# Altium PCB PCB_Sonography-v1.0.PcbDoc (part 1 of 3)
Units mil, origin at the board's own origin, x right, y up, seen from the top; angles counter-clockwise.
Board outline 1550.13 x 1118 mil, 4 copper layers (Top Layer, GND/Signal, PWR/Signal, Bottom Layer), stack 62.449 mil thick; 109 components, 55 nets, 355 pads, 157 vias.
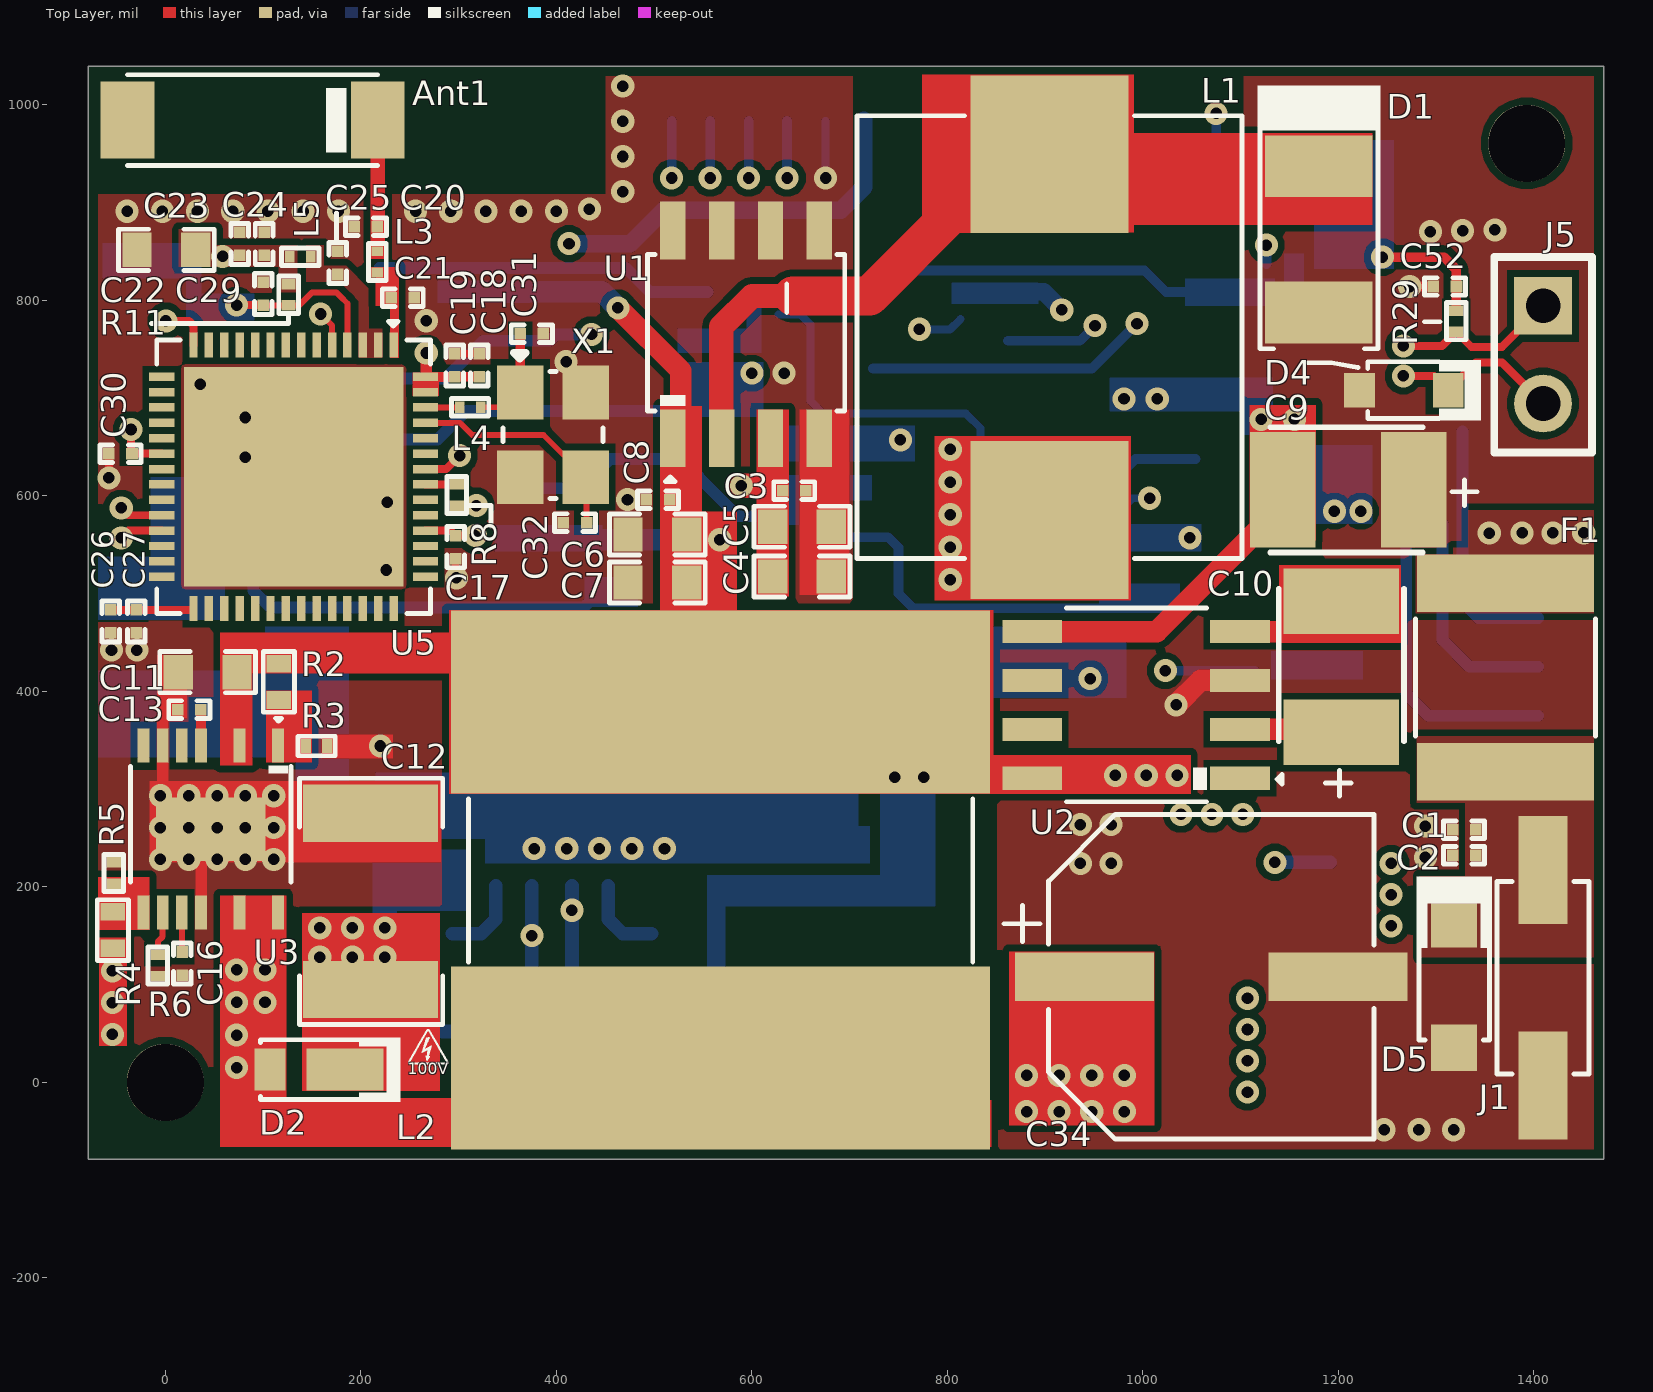
[diagram p0: Top Layer view]
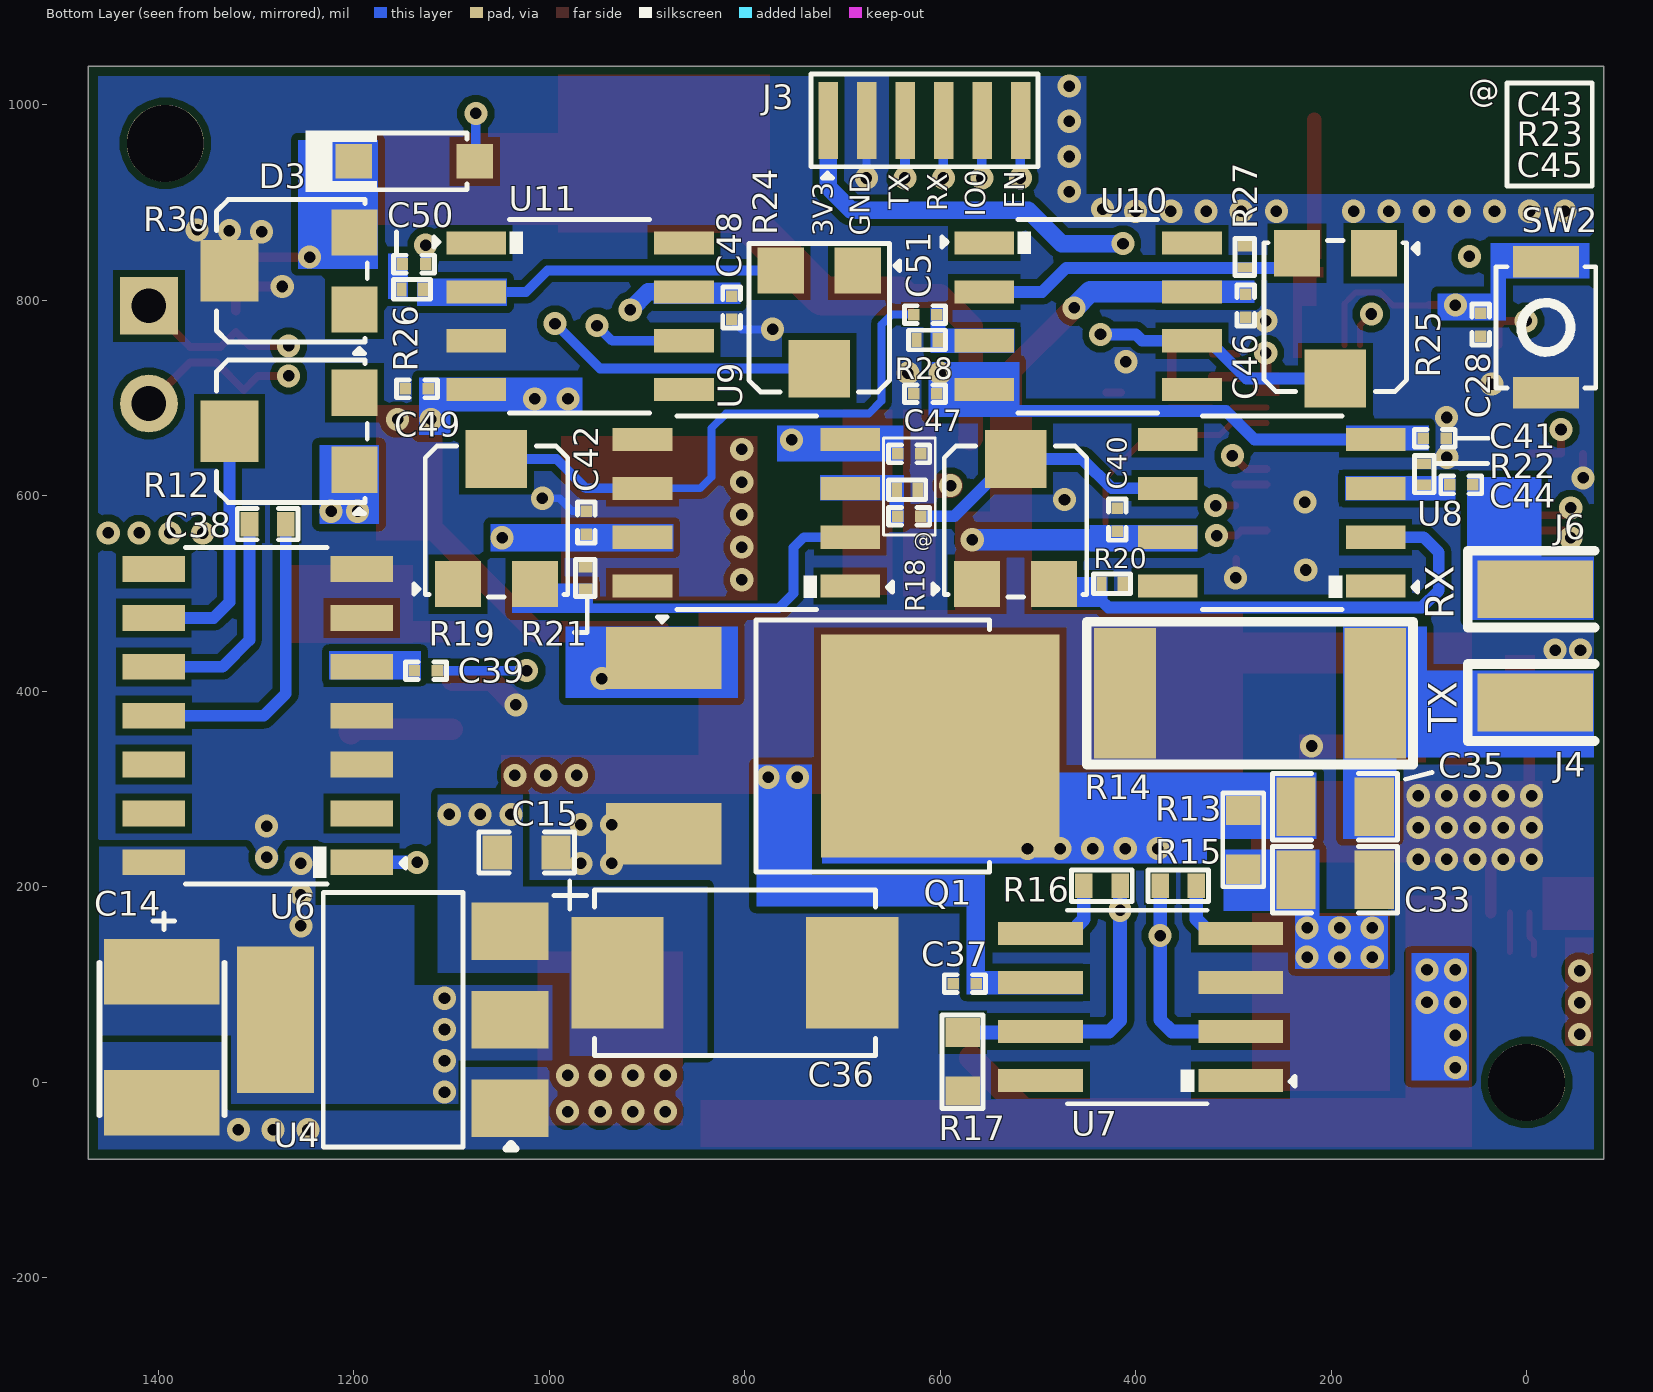
[diagram p1: Bottom Layer view, seen from below]
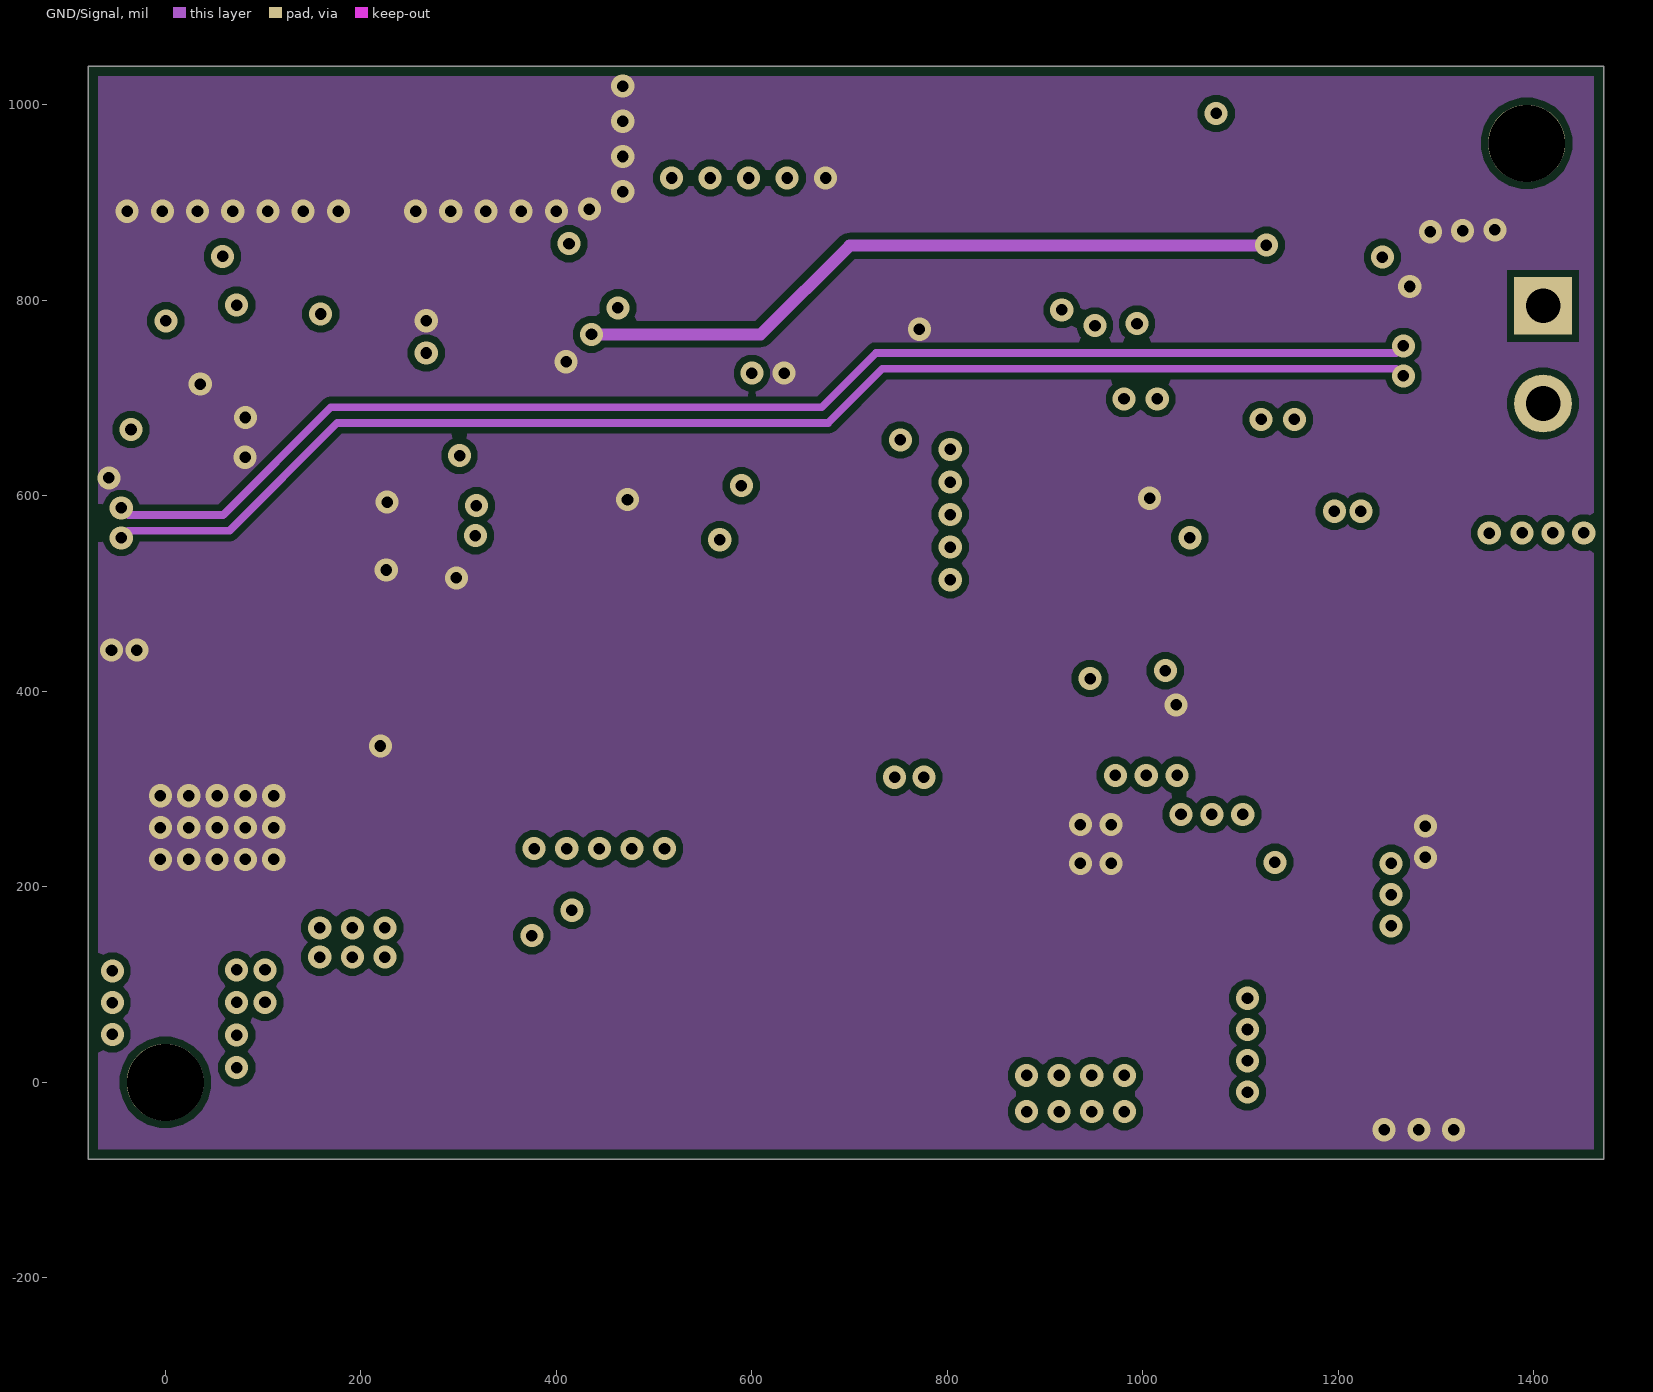
[diagram p2: GND/Signal]
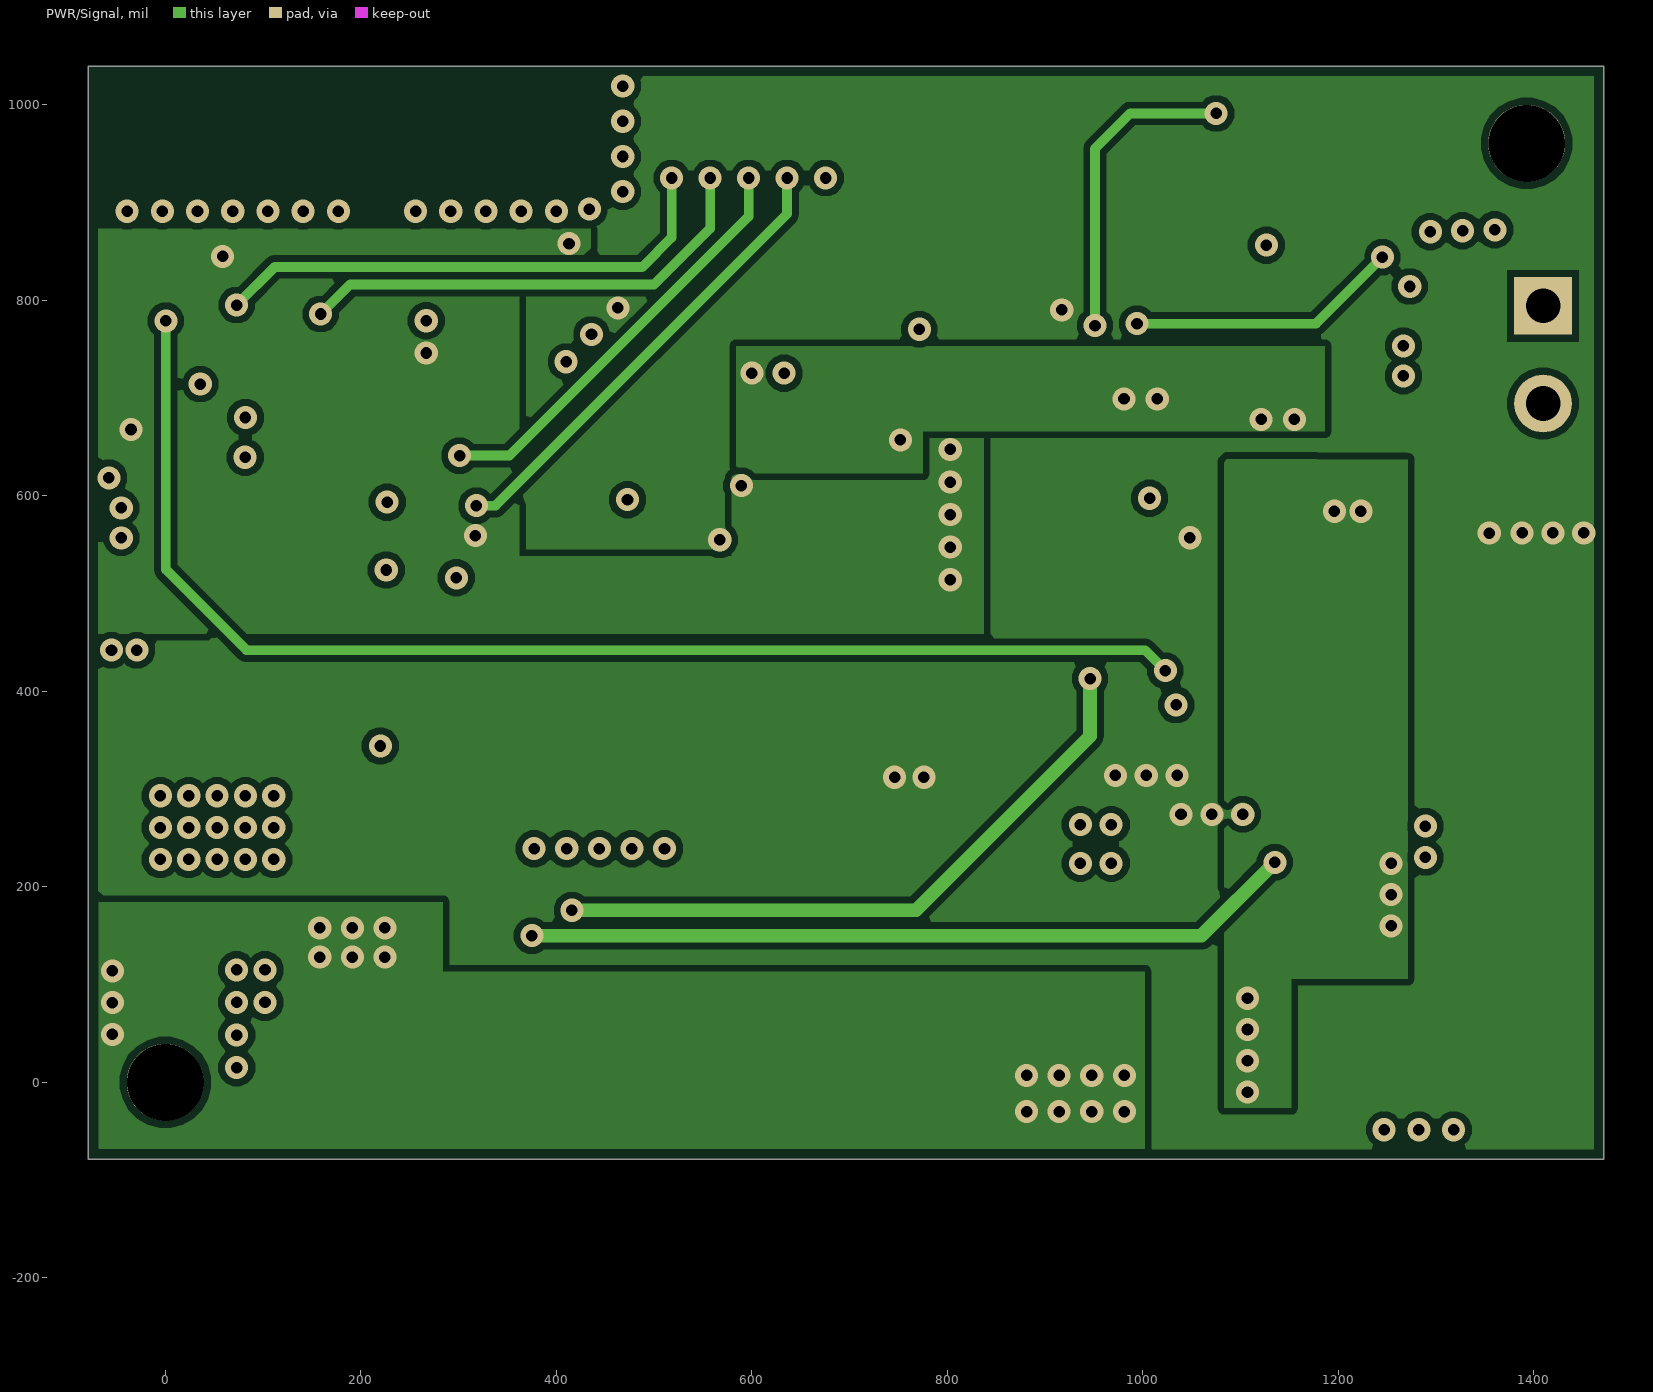
[diagram p3: PWR/Signal]
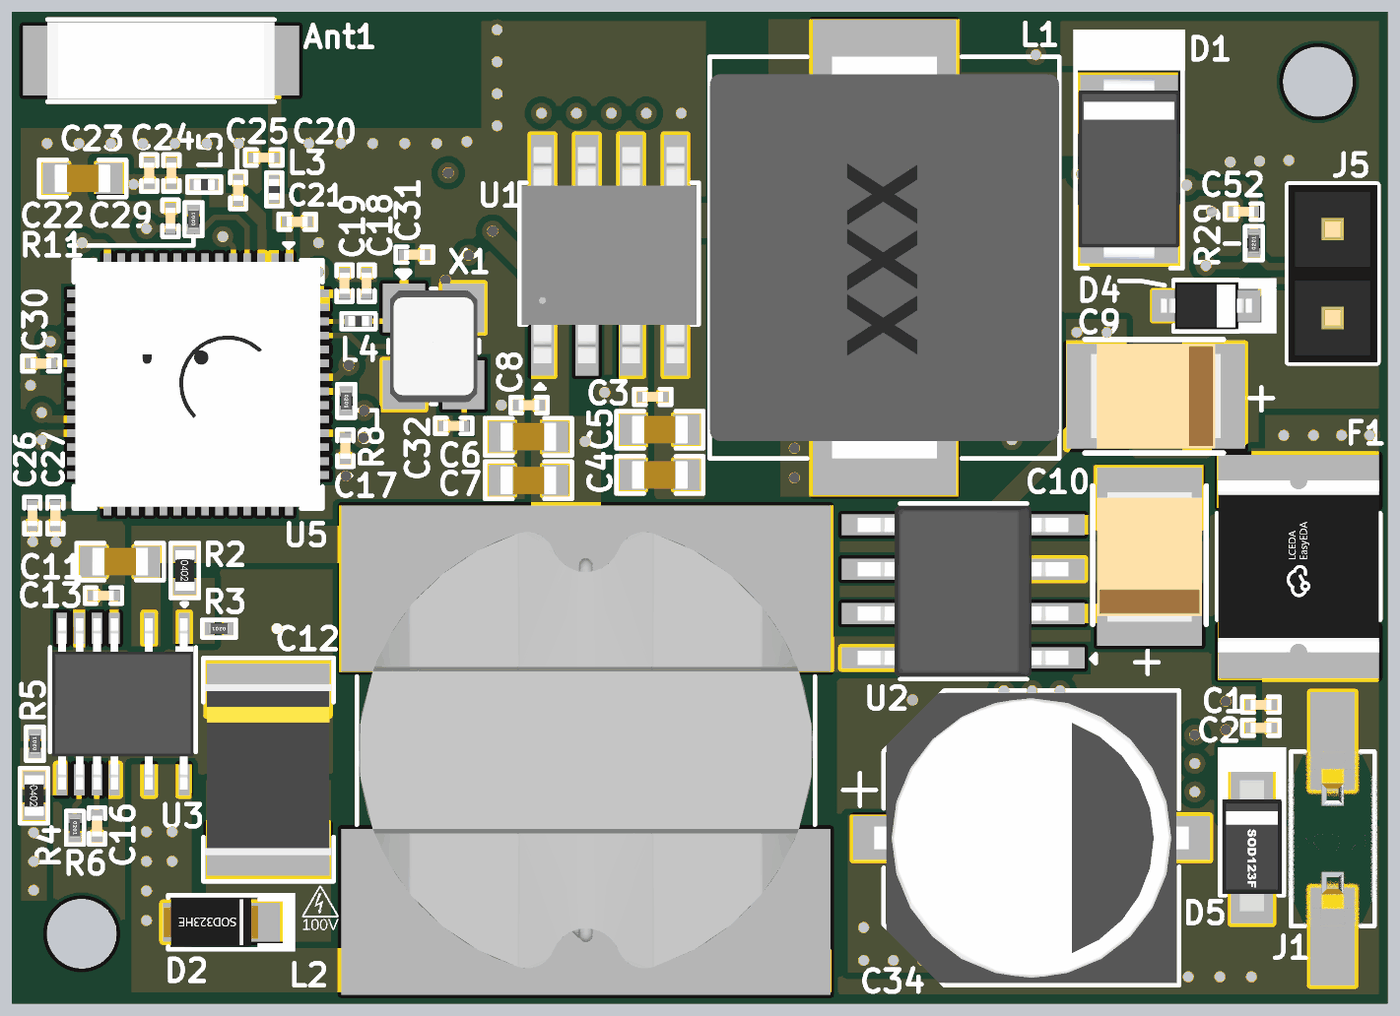
[diagram p5: 3D render of the assembled board from above, using the file's embedded part models]
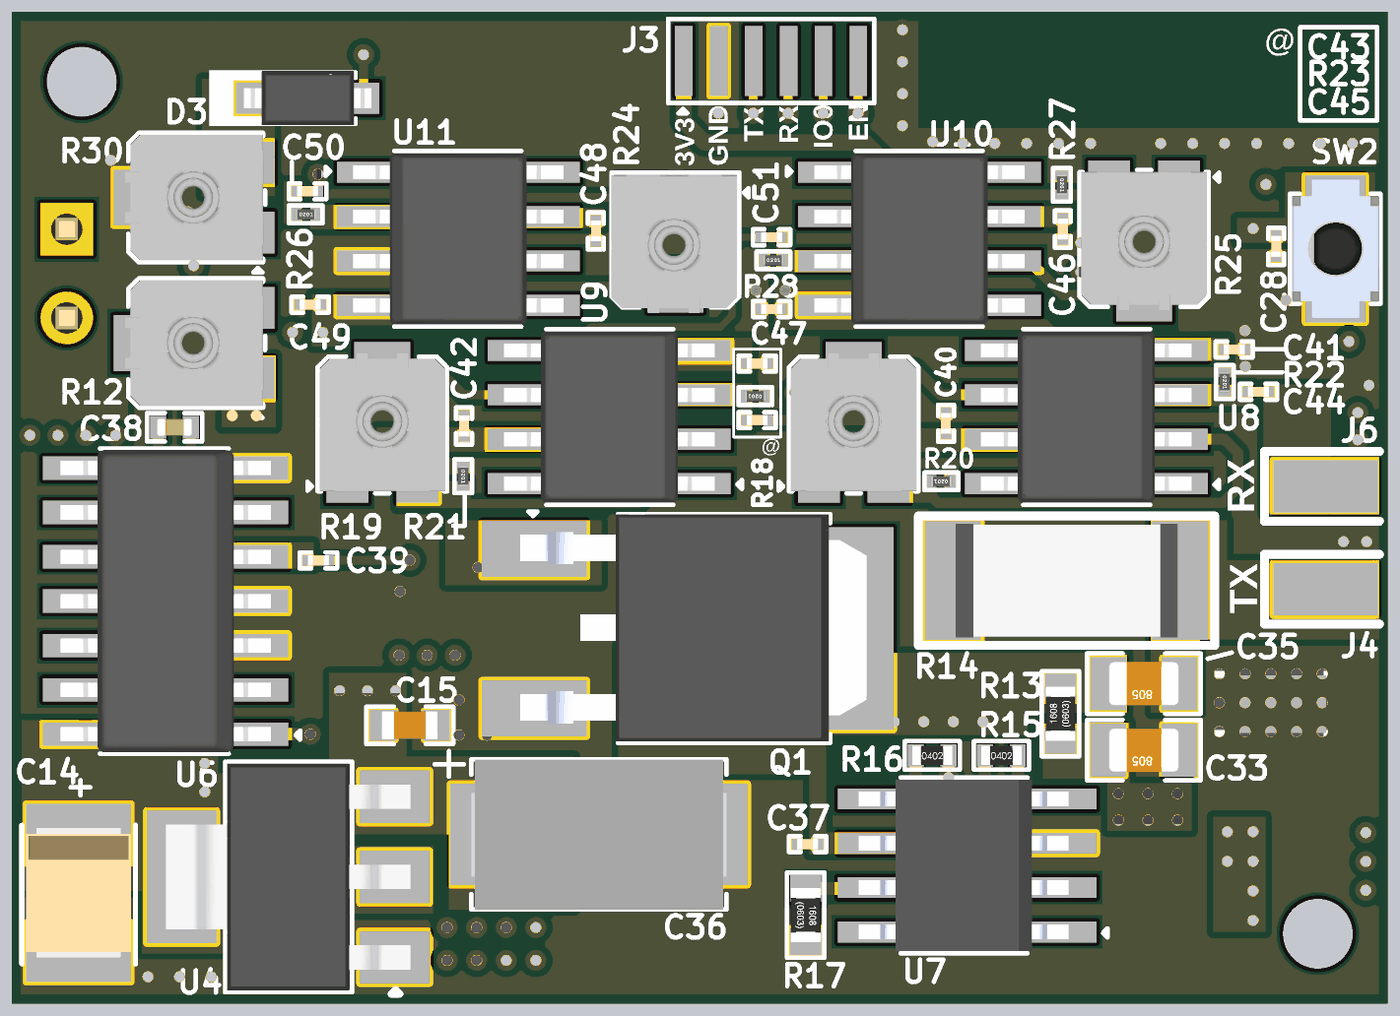
[diagram p6: 3D render of the assembled board from below, using the file's embedded part models]

## Layer stack, top to bottom
Top Solder: solder mask 0.394, Solder Resist, Dk 3.5
Top Layer: signal copper 1.378
Dielectric 2: prepreg 8.284, PP-006, Dk 4.4
GND/Signal: signal copper 0.598
Dielectric 1: core 41.929, FR-4, Dk 4.6
PWR/Signal: signal copper 0.598
Dielectric 3: prepreg 8.284, PP-006, Dk 4.4
Bottom Layer: signal copper 1.378
Bottom Solder: solder mask 0.394, Solder Resist, Dk 3.5

## Board outline
-78.74,-78.74 -78.74,1039.26 1471.39,1039.26 1471.39,-78.74

## Design rules (kind name [scope] priority, off if disabled: settings)
BoardOutlineClearance [All] p1: gap=0 ignorepadtopadclearanceinfootprint=FALSE except(10: Poly-OutlineEdge)
Clearance [All] p1: gap=7 ignorepadtopadclearanceinfootprint=FALSE except(4: Arc-SMDPad Track-SMDPad SMDPad-SMDPad)
DiffPairsRouting [All] p1: maxlimit=10 minlimit=6 mostfreqgap=8 toplayer_minwidth=6 toplayer_maxwidth=8 toplayer_prefwidth=8 midlayer1_minwidth=6 midlayer1_maxwidth=8 midlayer1_prefwidth=8 midlayer2_minwidth=6 midlayer2_maxwidth=8 midlayer2_prefwidth=8 bottomlayer_minwidth=6 bottomlayer_maxwidth=8 bottomlayer_prefwidth=8 maxuncoupledlength=500
HoleSize [All] p1: absolutevalues=TRUE maxlimit=1000 minlimit=1 maxpercent=80.000 minpercent=20.000
HoleToHoleClearance [All] p1: gap=0 allowstackedmicrovias=TRUE
MatchedLengths "Schematic Matched Net Lengths" [InNetClass('RX_OUT')] p1: tolerance=50 checknetsindiffpair=TRUE checkdiffpairvsdiffpair=FALSE checkxsignals=FALSE checkothers=FALSE
MaxMinImpedance "Schematic Impedance Constraint" [InNetClass('RX_OUT')] p1: minimum=85.00 maximum=90.00
MinimumSolderMaskSliver [All] p1: minsoldermaskwidth=0
PolygonConnect [All] p1: connectstyle=Direct reliefconductorwidth=10 reliefentries=4 polygonreliefangle="90 Angle" airgapwidth=10
RoutingVias [All] p1: holewidth=11.81 width=23.62 viastyle="Through Hole" minholewidth=11.81 minwidth=23.62 maxholewidth=31.5 maxwidth=62.99
SilkToSilkClearance [All] p1: silktosilkclearance=0
SilkToSolderMaskClearance [IsPad] p1: minsilkscreentomaskgap=0 clearancetoexposedcopper=TRUE
SolderMaskExpansion [All] p1: expansion=4 istentingtop=FALSE
UnRoutedNet [All] p1: checkbadconnections=TRUE
Width [All] p1: maxlimit=100 minlimit=6 preferedwidth=22
Width RF_Width [InNet('NetANT1_1')] p2: maxlimit=55 minlimit=15 preferedwidth=15 toplayer_maxwidth=15 bottomlayer_maxwidth=15 impedanceprofiledriven=TRUE impedanceprofileid={05ECE8B4-7C36-483A-8716-DD2929808501} impedanceprofilevalue=50.000000 minimp=50.000000 maximp=50.000000 favimp=50.000000 // Impedence
23 further rules are at their usual default settings.

## Classes and differential pairs
net class RF: NetANT1_1 NetC21_2
differential pair class RX_OUT_Lines: RX_OUT
net class RX_OUT: RX_OUT_N RX_OUT_P
component class U_Transmitter_Receiver_Section: C33 C34 C35 C36 C37 C38 C39 C40 C41 C42 C43 C44 C45 C46 C47 C48 C49 C50 C51 C52 D3 D4 J4 J5 J6 Q1 R12 R13 R14 R15 R16 R17 R18 R19 R20 R21 R22 R23 R24 R25 R26 R27 R28 R29 R30 U6 U7 U8 U9 U10 U11
component class U_Power_Section: C1 C2 C3 C4 C5 C6 C7 C8 C9 C10 C11 C12 C13 C14 C15 C16 D1 D2 D5 F1 J1 L1 L2 R2 R3 R4 R5 R6 U1 U2 U3 U4
component class U_Controller_Section: Ant1 C17 C18 C19 C20 C21 C22 C23 C24 C25 C26 C27 C28 C29 C30 C31 C32 J3 L3 L4 L5 R8 R11 SW2 U5 X1
differential pair RX_OUT: +RX_OUT_P -RX_OUT_N

## Components (designator, comment, footprint, x,y, rotation, side; value= is the part's Value field where it differs from the comment)
Ant1 "AN6520-245" AN6520-245 89.39,984.26 r180 top locked (schematic designator ANT1)
C1 "1uF" CAP-0201 1328.58,258.26 r0 top locked
C2 "0.1uF" CAP-0201 1328.58,232.26 r0 top locked value=100nF
C3 "0.1uF" CAP-0201 643.39,605.26 r180 top locked value=100nF
C4 "10uF" Cap-0603 651.39,517.26 r180 top locked
C5 "10uF" Cap-0603 651.39,568.26 r180 top locked
C6 "10uF" Cap-0603 503.38,560.26 r0 top locked
C7 "10uF" Cap-0603 503.38,511.26 r0 top locked
C8 "0.1uF" CAP-0201 504,596 r0 top locked value=100nF
C9 "10uF" Case-B 1210.07,606 r180 top locked
C10 "10uF" Case-B 1203,425 r90 top locked
C11 "10uF" Cap-0603 43.39,419.5 r180 top locked
C12 "1uF" Cap-1812 210,185 r270 top locked
C13 "1uF" CAP-0201 24.58,381.26 r180 top locked
C14 "10uF" Case-B 1396,46.07 r270 bottom locked
C15 "10uF" Cap-0603 1023,235 r0 bottom locked
C16 "0.1uF" CAP-0201 17.39,121.45 r270 top value=100nF
C17 "0.1uF" CAP-0201 297.1,547.36 r90 top locked value=100nF
C18 "1uF" CAP-0201 321.1,733.36 r270 top locked
C19 "0.1uF" CAP-0201 296.1,733.36 r270 top locked value=100nF
C20 "2.7pF" CAP-0201 205.19,875 r0 top locked
C21 "4.7pF" CAP-0201 242.91,802.55 r180 top locked
C22 "10uF" Cap-0603 1.1,851.55 r0 top locked
C23 "1uF" CAP-0201 76.1,857.55 r270 top locked
C24 "0.1uF" CAP-0201 101.1,857.55 r270 top locked value=100nF
C25 "0.1uF" CAP-0201 176.39,838.07 r270 top locked value=100nF
C26 "0.1uF" CAP-0201 -55.61,471.45 r90 top locked value=100nF
C27 "1uF" CAP-0201 -29.61,471.45 r90 top locked
C28 "0.1uF" CAP-0201 47,775 r90 bottom locked value=100nF
C29 "1uF" CAP-0201 100.1,806.55 r270 top locked
C30 "0.1uF" CAP-0201 -45.81,643 r0 top locked value=100nF
C31 "22pF" CAP-0201 374.91,765.55 r180 top locked
C32 "22pF" CAP-0201 419.1,572.55 r0 top locked
C33 "100nF" Cap-0805 196,207 r0 bottom locked
C34 "22uF" VKMD1652D220MV 1070,108 r0 top locked
C35 "100nF" Cap-0805 196,282 r0 bottom locked
C36 "47uF" Case-D 809.92,112 r180 bottom locked
C37 "0.1uF" CAP-0201 574.81,101 r180 bottom locked value=100nF
C38 "50pF" Cap-0402 1288,571 r0 bottom locked
C39 "1nF" CAP-0201 1126,421 r180 bottom locked
C40 "0.1uF" CAP-0201 418.89,575.45 r270 bottom locked value=100nF
C41 "0.1uF" CAP-0201 94.11,658.74 r0 bottom locked value=100nF
C42 "0.1uF" CAP-0201 961.9,572.45 r270 bottom locked value=100nF
C43 "0.1uF" CAP-0201 631.7,642.74 r0 bottom locked value=100nF
C44 "1nF" CAP-0201 67,611 r0 bottom locked
C45 "1nF" CAP-0201 631.7,579 r0 bottom locked
C46 "0.1uF" CAP-0201 287.4,794.45 r90 bottom locked value=100nF
C47 "0.1uF" CAP-0201 615.4,704.26 r180 bottom locked value=100nF
C48 "0.1uF" CAP-0201 813.39,792.45 r90 bottom locked value=100nF
C49 "0.1uF" CAP-0201 1135.2,709.26 r180 bottom locked value=100nF
C50 "1nF" CAP-0201 1138.2,837 r0 bottom locked
C51 "1nF" CAP-0201 615.4,785.26 r180 bottom locked
C52 "1nF" CAP-0201 1309,814 r0 top locked
D1 "B340A" SMA(DO-214AC) 1180,862.2 r270 top locked
D2 "RB558VAM150TR" SOD-323HE 145.62,13 r180 top locked
D3 "1N4148W" SOD-123 1137.99,942 r0 bottom locked
D4 "MM3Z3V3" SOD-323 1267,708 r180 top locked
D5 "SMF12A" SOD-123F 1318.39,98.27 r90 top locked
F1 "SMD2018-200" SMD2018-200 1371,414 r90 top locked
J1 "X6521WVS-2x01H-C60D74" X6521WVS-2x01H-C60D74 1409.39,107.02 r270 top locked
J3 "1x6P" 1x6p 615.94,984 r180 bottom locked
J4 "1P SMD PAD" "1P SMD PAD" -8.75,388.42 r270 bottom locked
J5 "826629-2" HDR1X2_ 1409.39,794.26 r270 top locked
J6 "1P SMD PAD" "1P SMD PAD" -8.75,504.42 r270 bottom locked
L1 "47uH" SMMS1050-470M 904.39,762.26 r270 top locked
L2 "100uH" SDR1307A-101K 568,207 r90 top locked
L3 "1.6nH" IND-0201 217,839.17 r270 top locked
L4 "24nH" IND-0201 311.92,690.55 r0 top locked
L5 "2nH" IND-0201 138.1,844.55 r0 top locked
Q1 "5N20A-252" DPAK 741.34,344 r270 bottom locked
R2 "1M" Res-0402 116.21,409.5 r270 top locked
R3 "287K" Res-0201 154.83,344 r180 top locked value=287kR
R4 "1M" Res-0402 -53.61,155.76 r270 top locked
R5 "16.2K" Res-0201 -52.61,214.09 r90 top locked
R6 "154K" Res-0201 -7.61,119.43 r270 top locked value=154kR
R8 "499R" Res-0201 298.1,600.72 r270 top locked
R11 "10K" Res-0201 126.1,805.55 r90 top locked
R12 "10K" TC33X-2-103E_ 1263,666 r90 bottom locked
R13 "3K" Res-0603 290,248 r270 bottom locked
R14 "51R" RES-2512 283,398 r180 bottom locked
R15 "0R" Res-0402 356.5,201 r180 bottom locked
R16 "0R" Res-0402 434.5,201 r180 bottom locked
R17 "10K" Res-0603 577,21 r90 bottom locked
R18 "10K" TC33X-2-103E_ 522.89,573.53 r180 bottom locked
R19 "10K" TC33X-2-103E_ 1053.87,573.53 r180 bottom locked
R20 "68R" Res-0201 424.17,510 r0 bottom locked
R21 "820R" Res-0201 962.9,515.83 r270 bottom locked
R22 "330R" Res-0201 105,622 r270 bottom locked
R23 "470R" Res-0201 633.7,606 r0 bottom locked
R24 "100K" TC33X-2-104E_ 684.39,830.39 r0 bottom locked
R25 "10K" TC33X-2-103E_ 195.68,783.97 r0 bottom locked
R26 "330R" Res-0201 1140.2,811 r180 bottom locked
R27 "1.5K" Res-0201 288.4,844.26 r270 bottom locked
R28 "1K" Res-0201 613.4,759.26 r180 bottom locked value=1kR
R29 "100R" Res-0201 1320.54,778.57 r90 top locked
R30 "10K" TC33X-2-103E_ 1263,830 r90 bottom locked
SW2 "B3U-1000P" B3U-1000P -19.61,772.26 r90 bottom locked
U1 "AP1509-33SG-13" SOP-8L 594.09,764.97 r90 top locked
U2 "TL7660CDR" "SOIC-8(0.154\", 3.90mm Width)" 993,386 r180 top locked
U3 "LT8331IMSE#TRPBF" 16-MSOP-EP 46.52,258.96 r270 top locked
U4 "AMS1117-5.0" "SOT- 223" 1160,64 r90 bottom locked
U5 "ESP32-S3FH4R2" "QFNWB-56 (7×7)" 131.25,619.42 r270 top locked
U6 "SN74121D" SOIC-14 1298,375 r0 bottom locked
U7 "ICL7667CBAZA" "SOIC-8(0.150\", 3.80mm Width)" 399,77 r0 bottom locked
U8 "AD811JRZ" "SOIC-8(0.154\", 3.90mm Width)" 260.89,582.55 r0 bottom locked
U9 "AD811JRZ" "SOIC-8(0.154\", 3.90mm Width)" 798.2,582.55 r0 bottom locked
U10 "AD811JRZ" "SOIC-8(0.154\", 3.90mm Width)" 448.68,783.47 r180 bottom locked
U11 "LM7171AIMX/NOPB" "SOIC-8(0.154\", 3.90mm Width)" 968.39,783.47 r180 bottom locked
X1 "40MHz" X322540MPB4SI_ 396.56,662.24 r270 top locked value=40MHZ

## Footprints (in the part's own frame and the unit in brackets; to place one, negate y for a bottom-side part, rotate by r counter-clockwise, add the part's x,y. Pads: shape width x height; smd on the part's side, far side on the other; paste and mask are expansions set on the pad)
"1P SMD PAD" [mm]
  rect 1.5x3 smd: 1(0,0)
  silkscreen extent -1,-1.75 1,1.54
1x6p [mm]
  rect 0.5x2 smd: 1(-2.5,0) 2(-1.5,0) 3(-0.5,0) 4(0.5,0) 5(1.5,0) 6(2.5,0)
  silkscreen extent -2.95,-1.5 2.95,1.21
16-MSOP-EP [mm]
  rect 0.889x0.305 smd: 1(-2.169,1.75) 3(-2.169,0.75) 5(-2.169,-0.25) 6(-2.169,-0.75) 7(-2.169,-1.25) 8(-2.169,-1.75) 9(2.17,-1.75) 10(2.17,-1.25) 11(2.17,-0.75) 12(2.17,-0.25) 14(2.17,0.75) 16(2.17,1.75)
  rect 1.651x2.845 smd: 17(0,0)
  silkscreen extent -2.88,-2.08 1.37,2.08, body extent -2.45,-2.02 2.45,2.02, height 1.07
AN6520-245 [mm]
  rect 1.4x2 smd: 1(-3.25,0) 2(3.25,0)
  silkscreen extent -3.25,-1.18 3.25,1.18, body extent -3.25,-1.1 3.25,1.1, height 1
B3U-1000P [mm] "SWITCH TACTILE SPST-NO 0.05A 12V"
  rect 0.82x1.72 smd: 1(-1.7,0) 2(1.7,0)
  silkscreen extent -1.57,-1.3 1.57,1.3, body extent -2,-1.26 2,1.24, height 1.6
CAP-0201 [mm]
  rect 0.3x0.3 smd mask+0.055: 1(-0.3,0) 2(0.3,0)
  silkscreen extent -0.53,-0.23 0.53,0.23, body extent -0.3,-0.15 0.3,0.15, height 0.28
Cap-0402 [mil]
  rect 18x25 smd mask+2.36: 1(-18.5,0) 2(18.5,0)
  silkscreen extent -31,-16 31,16, body extent -20,-10 20,10, height 19
Cap-0603 [mil]
  rect 30x35 smd mask+2.36: 1(-30,0) 2(30,0)
  silkscreen extent -49,-21 49,21, body extent -32,-16 31,16, height 34
Cap-0805 [mil] "SMD 0805"
  rect 40x60 smd mask+2.76: 1(-40,0) 2(40,0)
  silkscreen extent -64,-34 64,34, body extent -39,-25 39,25, height 30
Cap-1812 [mm]
  rect 1.485x3.507 smd: 1(-2.293,0) 2(2.293,0)
  silkscreen extent -3.2,-1.85 3.2,1.88, body extent -2.45,-1.8 2.45,1.8, height 2.79
Case-B [mm]
  rect 1.7x3 smd paste+0: 1(-1.7,0) 2(1.7,0)
  silkscreen extent -3.35,-1.63 2.03,1.63, body extent -1.85,-1.5 1.85,1.5, height 2.16
Case-D [mm]
  rect 2.4x2.9 smd: 1(-3.05,0) 2(3.05,0)
  silkscreen extent -4.7,-2.15 3.65,2.39, body extent -3.65,-2.16 3.65,2.14, height 4
DPAK [mm]
  rect 1.6x3 smd: 1(-2.285,-3.59) 3(2.285,-3.59)
  rect 5.8x6.2 smd: 2(0,3.59)
  silkscreen extent -3.35,-3.76 3.28,4.88, body extent -3.28,-3.99 3.22,5.92, height 2.51
HDR1X2_ [mm] "CONN HEADER VERT 2POS 2.54MM"
  rect 1.5x1.5 hole 0.9: 1(0,0)
  round 1.5 hole 0.9: 2(2.54,0)
  silkscreen extent -1.27,-1.27 3.81,1.27, body extent -1.27,-1.27 3.81,1.27, height 8.44
IND-0201 [mm]
  rect 0.25x0.3 smd mask+0.055: 1(-0.275,0) 2(0.275,0)
  silkscreen extent -0.48,-0.23 0.48,0.23, body extent -0.3,-0.15 0.3,0.15, height 0.15
"QFNWB-56 (7×7)" [mm]
  rect 0.65x0.22 smd: 1(-3.425,2.6) 2(-3.425,2.2) 3(-3.425,1.8) 4(-3.425,1.4) 5(-3.425,1) 6(-3.425,0.6) 7(-3.425,0.2) 8(-3.425,-0.2) 9(-3.425,-0.6) 10(-3.425,-1) 11(-3.425,-1.4) 12(-3.425,-1.8) 13(-3.425,-2.2) 14(-3.425,-2.6) 29(3.425,-2.6) 30(3.425,-2.2) 31(3.425,-1.8) 32(3.425,-1.4) 33(3.425,-1) 34(3.425,-0.6) 35(3.425,-0.2) 36(3.425,0.2) 37(3.425,0.6) 38(3.425,1) 39(3.425,1.4) 40(3.425,1.8) 41(3.425,2.2) 42(3.425,2.6)
  rect 0.22x0.65 smd: 15(-2.6,-3.425) 16(-2.2,-3.425) 17(-1.8,-3.425) 18(-1.4,-3.425) 19(-1,-3.425) 20(-0.6,-3.425) 21(-0.2,-3.425) 22(0.2,-3.425) 23(0.6,-3.425) 24(1,-3.425) 25(1.4,-3.425) 26(1.8,-3.425) 27(2.2,-3.425) 28(2.6,-3.425) 43(2.6,3.425) 44(2.2,3.425) 45(1.8,3.425) 46(1.4,3.425) 47(1,3.425) 48(0.6,3.425) 49(0.2,3.425) 50(-0.2,3.425) 51(-0.6,3.425) 52(-1,3.425) 53(-1.4,3.425) 54(-1.8,3.425) 55(-2.2,3.425) 56(-2.6,3.425)
  rect 5.7x5.7 smd: 57(0,0)
  silkscreen extent -4.04,-3.56 3.56,3.56, body extent -3.5,-3.51 3.5,3.49, height 0.92
Res-0201 [mm]
  rect 0.27x0.37 smd mask+0.055: 1(-0.275,0) 2(0.275,0)
  silkscreen extent -0.48,-0.25 0.48,0.25, body extent -0.3,-0.15 0.3,0.15, height 0.29
Res-0402 [mil]
  rect 18x25 smd mask+2.17: 1(-18.5,0) 2(18.5,0)
  silkscreen extent -32,-17 32,16, body extent -23,-11 23,11, height 16
Res-0603 [mil]
  rect 30x35 smd: 1(-30,0) 2(30,0)
  silkscreen extent -48,-21 48,21, body extent -31,-17 31,17, height 18
RES-2512 [mm]
  rect 1.6x3.4 smd: 1(-3.25,0) 2(3.25,0)
  silkscreen extent -4.24,-1.85 4.24,1.85, body extent -3.17,-1.63 3.18,1.63, height 0.58
SDR1307A-101K [mm]
  rect 4.75x14 smd: 1(-4.625,0) 2(4.625,0)
  silkscreen extent -2.13,-6.55 2.11,6.55, body extent -6.25,-6.49 6.25,6.49, height 6.94
SMA(DO-214AC) [mm]
  rect 1.6x2.8 smd: 1(-1.9,0) 2(1.9,0)
  silkscreen extent -3.99,-1.6 2.84,1.6, body extent -2.6,-1.45 2.6,1.45, height 2.3
SMD2018-200 [mm]
  rect 1.5x4.6 smd: 1(-2.45,0) 2(2.45,0)
  silkscreen extent -1.52,-2.34 1.52,2.34, body extent -2.46,-2.31 2.46,2.31, height 0.62
SMMS1050-470M [mm]
  rect 4.1x4.1 smd: 1(-4.75,0) 2(4.75,0)
  silkscreen extent -5.75,-5 5.75,5, body extent -5.75,-5 5.75,5, height 4.9
SOD-123 [mm]
  rect 0.95x0.9 smd: 1(-1.575,0) 2(1.575,0)
  silkscreen extent -1.37,-0.8 2.82,0.8, body extent -1.82,-0.77 1.83,0.78, height 1.5
SOD-123F [mm]
  rect 1.2x1.2 smd: 1(1.6,0) 1(1.6,0) 2(-1.6,0)
  silkscreen extent -1.4,-0.98 2.85,0.98, body extent -1.85,-0.85 1.9,0.85, height 1.2
SOD-323 [mm]
  rect 0.8x0.9 smd mask+0.055: 1(-1.15,0) 2(1.15,0)
  silkscreen extent -2.01,-0.79 0.94,0.79, body extent -1.3,-0.67 1.3,0.67, height 1.1
SOD-323HE [mm]
  rect 2x1.1 smd: 1(-0.975,0)
  rect 0.8x1.1 smd: 2(0.975,0)
  silkscreen extent -2.41,-0.84 1.22,0.84, body extent -1.35,-0.7 1.35,0.7, height 0.75
"SOIC-8(0.150\", 3.80mm Width)" [mm]
  rect 2.2x0.6 smd: 1(-2.7,1.905) 2(-2.7,0.635) 3(-2.7,-0.635) 4(-2.7,-1.905) 4(-2.7,-1.905) 5(2.5,-1.905) 6(2.5,-0.635) 7(2.5,0.635) 8(2.5,1.905)
  silkscreen extent -4.11,-2.51 1.8,2.51, body extent -3,-2.45 3,2.45, height 1.75
"SOIC-8(0.154\", 3.90mm Width)" [mm]
  rect 1.55x0.6 smd: 1(-2.7,1.905) 2(-2.7,0.635) 3(-2.7,-0.635) 4(-2.7,-1.905) 5(2.7,-1.905) 6(2.7,-0.635) 7(2.7,0.635) 8(2.7,1.905)
  silkscreen extent -3.79,-2.51 1.8,2.51, body extent -3.01,-2.45 3.01,2.45, height 1.63
SOIC-14 [mm]
  rect 1.62x0.67 smd: 1(-2.7,3.81) 2(-2.7,2.54) 3(-2.7,1.27) 4(-2.7,0) 5(-2.7,-1.27) 6(-2.7,-2.54) 7(-2.7,-3.81) 8(2.7,-3.81) 9(2.7,-2.54) 10(2.7,-1.27) 11(2.7,0) 12(2.7,1.27) 13(2.7,2.54) 14(2.7,3.81)
  silkscreen extent -3.84,-4.37 1.88,4.37, body extent -3.01,-4.33 3.01,4.33, height 1.75
SOP-8L [mm]
  rect 1.5x0.66 smd: 1(-2.7,1.905) 2(-2.7,0.635) 3(-2.7,-0.635) 4(-2.7,-1.905) 5(2.7,-1.905) 6(2.7,-0.635) 7(2.7,0.635) 8(2.7,1.905)
  silkscreen extent -3.82,-2.57 2.08,2.57, body extent -3.1,-2.5 3.1,2.5, height 1.76
"SOT- 223" [mm]
  rect 1.5x2 smd: 1(-2.3,-3.05) 2(0,-3.05) 3(2.3,-3.05)
  rect 3.8x2 smd: 4(0,3.05)
  silkscreen extent -3.35,-3.2 3.3,1.8, body extent -3.25,-3.5 3.25,3.5, height 1.61
TC33X-2-103E_ [mm]
  rect 1.2x1.2 smd: 1(-1,-1.625) 3(1,-1.625)
  rect 1.6x1.5 smd: 2(0,1.625)
  silkscreen extent -2.14,-1.96 1.85,1.96, body extent -1.8,-1.91 1.8,2.05, height 1.13
TC33X-2-104E_ [mm]
  rect 1.2x1.2 smd: 1(0,0) 3(2,0)
  rect 1.6x1.5 smd: 2(1,2.55)
  silkscreen extent -1.09,-0.7 2.83,3.15, body extent -0.76,-0.64 2.84,3.32, height 1.13
VKMD1652D220MV [mm]
  rect 3.61x1.26 smd: 1(-3.295,0) 2(3.295,0)
  silkscreen extent -5.39,-4.22 4.23,4.22, body extent -4.5,-4.15 4.5,4.15, height 10.15
X6521WVS-2x01H-C60D74 [mm]
  rect 2.8x1.27 smd: 1(-2.8,0) 2(2.8,0)
  silkscreen extent -2.5,-1.19 2.5,1.19, body extent -3.7,-1.27 3.7,1.28, height 8.14
X322540MPB4SI_ [mm]
  rect 1.4x1.2 smd: 1(-1.1,-0.85) 2(1.1,-0.85) 3(1.1,0.85) 4(-1.1,0.85)
  silkscreen extent -2.13,-1.3 1.65,1.3, body extent -1.6,-1.25 1.6,1.25, height 0.8

## Part data
Ant1: "SMD Antennas ROHS", LCSC Part Number=C239238, Manufacturer="Rainsun microwave Tech", ComponentLink1Description=LCSC, ComponentLink1URL=https://www.lcsc.com/product-detail/Antennas_Rainsun-microwave-Tech-AN6520-245_C239238.html, Manufacturer Part Number=AN6520-245
C1 C13 C18 C23 C27 C29: library part GRM033R61C105ME15D, "CAP CER 1UF 16V X5R 0201", LCSC Part Number=C335102, Manufacturer=Murata, Supplier Part Number 1=490-18654-1-ND, Category="Ceramic Capacitors", ComponentLink1Description=https://datasheet.octopart.com/GRM033R61C105ME15D-Murata-datasheet-155345049.pdf?src-supplier=Element14, ComponentLink1URL=https://datasheet.octopart.com/GRM033R61C105ME15D-Murata-datasheet-155345049.pdf?src-supplier=Element14, ComponentLink2Description=https://datasheet.octopart.com/GRM033R61C105ME15D-Murata-datasheet-165579666.pdf?src-supplier=TME, ComponentLink2URL=https://datasheet.octopart.com/GRM033R61C105ME15D-Murata-datasheet-165579666.pdf?src-supplier=TME, Item Type=Capacitor, Manufacturer Part Number=GRM033R61C105ME15D, Pricing 1="1=0.14, 10=0.098, 50=0.0554, 100=0.0459, 500=0.0322, 1000=0.02665, 2500=0.02481, 5000=0.0227 (USD)", RoHS=No, Stock 1=12823, Supplier 1=Digi-Key
C2 C3 C8 C16 C17 C19 C24 C25 C26 C28 C30 C37 C40 C41 C42 C43 C46 C47 C48 C49: library part GRM033R61E104KE14D, "CAP CER 0.1UF 25V X5R 0201", Case Code (Imperial)=0201, Case Code (Metric)=0603, Dielectric=X5R, LCSC Part Number=C76939, Manufacturer=Murata, Max Operating Temperature=85°C, Min Operating Temperature=-55°C, Package Quantity=15000, Supplier Part Number=1852066, Tolerance=10%, Voltage Rating=25V, Case/Package=0201, Category="Ceramic Capacitors", ComponentLink1Description=http://www.farnell.com/datasheets/2867843.pdf?src-supplier=Farnell, ComponentLink1URL=http://www.farnell.com/datasheets/2867843.pdf?src-supplier=Farnell, ComponentLink2Description=http://www.mouser.com/ds/2/281/c02e-2905.pdf?src-supplier=Mouser, ComponentLink2URL=http://www.mouser.com/ds/2/281/c02e-2905.pdf?src-supplier=Mouser, ComponentLink3Description=https://datasheet.octopart.com/GRM033R61E104KE14D-Murata-datasheet-22122223.pdf?src-supplier=Future+Electronics, ComponentLink3URL=https://datasheet.octopart.com/GRM033R61E104KE14D-Murata-datasheet-22122223.pdf?src-supplier=Future+Electronics, ComponentLink4Description=http://www.farnell.com/datasheets/2867843.pdf?src-supplier=Element14, ComponentLink4URL=http://www.farnell.com/datasheets/2867843.pdf?src-supplier=Element14, ComponentLink5Description=http://search.murata.co.jp/Ceramy/image/img/A01X/G101/ENG/GRM033R61E104KE14-01.pdf?src-supplier=Digi-Key, ComponentLink5URL=http://search.murata.co.jp/Ceramy/image/img/A01X/G101/ENG/GRM033R61E104KE14-01.pdf?src-supplier=Digi-Key, ComponentLink6Description=http://www.farnell.com/datasheets/2867843.pdf?src-supplier=Newark, ComponentLink6URL=http://www.farnell.com/datasheets/2867843.pdf?src-supplier=Newark, ComponentLink7Description=https://datasheet.octopart.com/GRM033R61E104KE14D-Murata-datasheet-165579666.pdf?src-supplier=TME, ComponentLink7URL=https://datasheet.octopart.com/GRM033R61E104KE14D-Murata-datasheet-165579666.pdf?src-supplier=TME, Height=0.3mm, Item Type=Capacitor, Lead Free="Lead Free", Length=0.024inch, Manufacturer Part Number=GRM033R61E104KE14D, Material=4241ConductorMaterial, Mounting Technology="Surface Mount", Packaging="Tape and Reel", Pricing="1000=0.008, 5000=0.007, 10000=0.006 (GBP)", RoHS=Yes, RoHS Compliant=Yes, Series=GRM, Stock=14000, Supplier=Rs, Termination=SMD/SMT, Thickness=0.013inch, Voltage Rating (DC)=25V, Weight=1.2E-05oz, Width=0.012inch
C4 C5 C6 C7 C11 C15 C22: library part GRM188R6YA106MA73D, "10uF 35V X5R 20% Pad SMD 0603", Case Code (Imperial)=0603, Case Code (Metric)=1608, Dielectric=X5R, LCSC Part Number=C194427, Manufacturer=Murata, Max Operating Temperature=85°C, Min Operating Temperature=-55°C, Tolerance=20%, Voltage Rating=35V, Capacitance=10uF, Case/Package=0603, Category="Ceramic Capacitors", ComponentLink1Description=http://search.murata.co.jp/Ceramy/image/img/A01X/G101/ENG/GRM188R6YA106MA73-01.pdf?src-supplier=Future+Electronics, ComponentLink1URL=http://search.murata.co.jp/Ceramy/image/img/A01X/G101/ENG/GRM188R6YA106MA73-01.pdf?src-supplier=Future+Electronics, ComponentLink2Description=http://search.murata.co.jp/Ceramy/image/img/A01X/G101/ENG/GRM188R6YA106MA73-01.pdf?src-supplier=Digi-Key, ComponentLink2URL=http://search.murata.co.jp/Ceramy/image/img/A01X/G101/ENG/GRM188R6YA106MA73-01.pdf?src-supplier=Digi-Key, ComponentLink3Description=https://www.murata.com/~/media/webrenewal/support/library/catalog/products/capacitor/mlcc/c02e.ashx?la=en-us&src-supplier=Digi-Key, ComponentLink3URL=https://www.murata.com/~/media/webrenewal/support/library/catalog/products/capacitor/mlcc/c02e.ashx?la=en-us&src-supplier=Digi-Key, ComponentLink4Description=http://search.murata.co.jp/Ceramy/image/img/A01X/G101/ENG/GRM188R6YA106MA73-01.pdf?src-supplier=Mouser, ComponentLink4URL=http://search.murata.co.jp/Ceramy/image/img/A01X/G101/ENG/GRM188R6YA106MA73-01.pdf?src-supplier=Mouser, ComponentLink5Description=http://search.murata.co.jp/Ceramy/image/img/A01X/G101/ENG/GRM188R6YA106MA73-01.pdf?src-supplier=TTI, ComponentLink5URL=http://search.murata.co.jp/Ceramy/image/img/A01X/G101/ENG/GRM188R6YA106MA73-01.pdf?src-supplier=TTI, Length=0.063inch, Manufacturer Part Number=GRM188R6YA106MA73D, Mount="Surface Mount", Packaging="Tape and Reel", Pricing 1="1=0.36650, 10=0.23380, 25=0.23160, 100=0.15050, 250=0.14890, 500=0.10700, 1000=0.09270, 3000=0.08640, 6000=0.07720, 15000=0.07140, 30000=0.05840 (USD)", RoHS=Yes, RoHS Compliant=Yes, Stock 1=37601, Supplier 1="Arrow Electronics", Supplier Part Number 1=GRM188R6YA106MA73D, Thickness=0.039inch, Voltage Rating (DC)=35V, Width=0.031inch
C9 C10 C14: library part CA45-B025K106T, "10uF 25V 2.5Ω@100kHz ±10% CASE-B-3528 Tantalum Capacitors ROHS", LCSC Part Number=C119050, Manufacturer="Xiangyee in S&T", Package=Case-B, ComponentLink1Description=LCSC, ComponentLink1URL=https://www.lcsc.com/product-detail/Tantalum-Capacitors_Hunan-Xiangyee-in-S-T-CA45-B025K106T_C119050.html, Item Type=Capacitor, Manufacturer Part Number=CA45-B025K106T
C12: library part FS43X105K251EGG, "250V 1uF X7R ±10% 1812 Multilayer Ceramic Capacitors MLCC - SMD/SMT ROHS", LCSC Part Number=C381468, Manufacturer=PSA, Package=1812, ComponentLink1Description=LCSC, ComponentLink1URL=https://www.lcsc.com/product-detail/Multilayer-Ceramic-Capacitors-MLCC-SMD-SMT_PSA-Prosperity-Dielectrics-FS43X105K251EGG_C381468.html, Item Type=Capacitor, Manufacturer Part Number=FS43X105K251EGG
C20: library part CC0201CRNPO9BN2R7, "CAP CER 2.7PF 50V C0G/NPO 0201", Case Code (Imperial)=0201, Case Code (Metric)=0603, Dielectric=C0G, LCSC Part Number=C325439, Manufacturer=Yageo, Max Operating Temperature=125°C, Min Operating Temperature=-55°C, Voltage Rating=50V, Case/Package=0201, Category="Ceramic Capacitors", ComponentLink1Description=https://datasheet.ciiva.com/13208/upy-gp-np0-16v-to-50v-8-13208314.pdf?src-supplier=Mouser, ComponentLink1URL=https://datasheet.ciiva.com/13208/upy-gp-np0-16v-to-50v-8-13208314.pdf?src-supplier=Mouser, Item Type=Capacitor, Length=0.024inch, Manufacturer Part Number=CC0201CRNPO9BN2R7, Mounting Technology="Surface Mount", Packaging="Tape and Reel", Pricing="15000=0.0017 (USD)", RoHS=Yes, RoHS Compliant=Yes, Series=CC, Stock=15000, Supplier=Avnet, Supplier Part Number=CC0201CRNPO9BN2R7, Termination=SMD/SMT, Thickness=0.013inch, Voltage Rating (DC)=50V, Weight=6E-06oz, Width=0.012inch
C21: library part CC0201BRNPO9BN4R7, "CAP CER 4.7PF 50V C0G/NPO 0201", Case/Package=0201, LCSC Part Number=C505471, Manufacturer=Yageo, Max Operating Temperature=125°C, Min Operating Temperature=-55°C, Voltage Rating=50V, Category="Ceramic Capacitors", ComponentLink1Description=https://www.yageo.com/upload/media/product/productsearch/datasheet/mlcc/UPY-GP_NP0_16V-to-50V_18.pdf?src-supplier=Digi-Key, ComponentLink1URL=https://www.yageo.com/upload/media/product/productsearch/datasheet/mlcc/UPY-GP_NP0_16V-to-50V_18.pdf?src-supplier=Digi-Key, ComponentLink2Description=http://www.yageo.com/documents/recent/UPY-GP_NP0_16V-to-50V_16.pdf?src-supplier=Digi-Key, ComponentLink2URL=http://www.yageo.com/documents/recent/UPY-GP_NP0_16V-to-50V_16.pdf?src-supplier=Digi-Key, Item Type=Capacitor, Length=0.024inch, Manufacturer Part Number=CC0201BRNPO9BN4R7, Mounting Technology="Surface Mount", Packaging="Tape and Reel", Pricing="15000=0.0023 (USD)", RoHS=Yes, RoHS Compliant=Yes, Series=CC, Stock=210000, Supplier="Arrow Electronics", Supplier Part Number=CC0201BRNPO9BN4R7, Thickness=0.013inch, Width=0.012inch
C31 C32: library part GRM0335C1H220JA01D, "CAP CER 22PF 50V C0G/NP0 0201", Case Code (Imperial)=0201, Case Code (Metric)=0603, Dielectric=C0G, LCSC Part Number=C76924, Manufacturer=Murata, Max Operating Temperature=125°C, Min Operating Temperature=-55°C, Package Quantity=1, Supplier Part Number=8202728, Temperature Coefficient=30ppm/°C, Tolerance=5%, Voltage=50V, Case/Package=0201, Category="Ceramic Capacitors", ComponentLink1Description=https://datasheet.ciiva.com/6271/partnumbering-e-01-6271146.pdf?src-supplier=Digi-Key, ComponentLink1URL=https://datasheet.ciiva.com/6271/partnumbering-e-01-6271146.pdf?src-supplier=Digi-Key, ComponentLink2Description=https://datasheet.ciiva.com/6271/partnumbering-e-01-6271143.pdf?src-supplier=Digi-Key, ComponentLink2URL=https://datasheet.ciiva.com/6271/partnumbering-e-01-6271143.pdf?src-supplier=Digi-Key, ComponentLink3Description=https://datasheet.ciiva.com/6271/partnumbering-e-01-6271149.pdf?src-supplier=Digi-Key, ComponentLink3URL=https://datasheet.ciiva.com/6271/partnumbering-e-01-6271149.pdf?src-supplier=Digi-Key, Depth=0.3mm, Height=0.3mm, Item Type=Capacitor, Lead Free="Lead Free", Length=0.024inch, Manufacturer Part Number=GRM0335C1H220JA01D, Material=4241ConductorMaterial, Mounting Technology="Surface Mount", Packaging="Tape and Reel", Pricing="500=0.004, 5000=0.003, 12500=0.002, 50000=0.002 (GBP)", RoHS=Yes, RoHS Compliant=Yes, Series=GRM, Stock=9500, Supplier=Rs, Termination=SMD/SMT, Voltage Rating=50V, Voltage Rating (DC)=50V, Width=0.012inch
C33 C35: library part FM21X104K201ECG, "200V 100nF X7R ±10% 0805 Multilayer Ceramic Capacitors MLCC - SMD/SMT ROHS", LCSC Part Number=C784084, Manufacturer=PSA, Package=0805, ComponentLink1Description=LCSC, ComponentLink1URL=https://www.lcsc.com/product-detail/Multilayer-Ceramic-Capacitors-MLCC-SMD-SMT_PSA-Prosperity-Dielectrics-FM21X104K201ECG_C784084.html, Item Type=Capacitor, Manufacturer Part Number=FM21X104K201ECG
C34: library part VKMD1652D220MV, "22uF 200V 320mA@100kHz ±20% SMD,D8xL16.5mm Aluminum Electrolytic Capacitors - SMD ROHS", LCSC Part Number=C487500, Manufacturer=Ymin, Package=SMD,D8xL16.5mm, ComponentLink1Description=LCSC, ComponentLink1URL=https://www.lcsc.com/product-detail/Aluminum-Electrolytic-Capacitors-SMD_Ymin-VKMD1652D220MV_C487500.html, Item Type="Electrolytic Capacitor", Manufacturer Part Number=VKMD1652D220MV
C36: library part CA45-D025K476T, "47uF 25V 0.9Ω@100kHz ±10% CASE-D-7343 Tantalum Capacitors ROHS", LCSC Part Number=C123267, Manufacturer="Hunan Xiangyee in S&T", Package=CASE-D-7343, ComponentLink1Description=LCSC, ComponentLink1URL=https://www.lcsc.com/product-detail/Tantalum-Capacitors_Hunan-Xiangyee-in-S-T-CA45-D025K476T_C123267.html, Item Type=Capacitor, Manufacturer Part Number=CA45-D025K476T
C38: library part 0402CG500J500NT, "50V 50pF C0G ±5% 0402 Multilayer Ceramic Capacitors MLCC - SMD/SMT ROHS", LCSC Part Number=C501830, Manufacturer=FH, ComponentLink1Description=LCSC, ComponentLink1URL=https://www.lcsc.com/product-detail/Multilayer-Ceramic-Capacitors-MLCC-SMD-SMT_FH-Guangdong-Fenghua-Advanced-Tech-0402CG500J500NT_C501830.html, Item Type=Capacitor, Manufacturer Part Number=0402CG500J500NT
C39 C44 C45 C50 C51 C52: library part 0201B102K500NT, "50V 1nF X7R ±10% 0201 Multilayer Ceramic Capacitors MLCC - SMD/SMT ROHS", LCSC Part Number=C66942, Manufacturer=FH, ComponentLink1Description=LCSC, ComponentLink1URL=https://www.lcsc.com/product-detail/Multilayer-Ceramic-Capacitors-MLCC-SMD-SMT_FH-Guangdong-Fenghua-Advanced-Tech-0201B102K500NT_C66942.html, Item Type=Capacitor, Manufacturer Part Number=0201B102K500NT
D1: "40V 3A 550mV@3A SMA(DO-214AC) Schottky Barrier Diodes (SBD) ROHS", LCSC Part Number=C3018525, Manufacturer=FUXINSEMI, Package=SMA(DO-214AC), ComponentLink1Description=LCSC, ComponentLink1URL=https://www.lcsc.com/product-detail/Schottky-Barrier-Diodes-SBD_FUXINSEMI-B340A_C3018525.html, Item Type=Diode, Manufacturer Part Number=B340A
D2: "Diode Schottky 150V 500mA 2-Pin SOD-323HE Emboss T/R", Average Rectified Current=500mA, Case/Package=SMD/SMT, LCSC Part Number=C5336764, Manufacturer=Rohm, Max Reverse Voltage (DC)=150V, Supplier Part Number=846-RB558VAM150TR-ND, Category="Schottky Diodes", Item Type="Schottky Barrier Diodes", Manufacturer Part Number=RB558VAM150TR, Mounting Technology="Surface Mount", Pricing="3000=0.07231, 6000=0.06914, 9000=0.05979, 30000=0.05867, 75000=0.04858, 150000=0.04783 (USD)", RoHS=Yes, RoHS Compliant=Yes, Stock=30000, Supplier=Digi-Key
D3: "100V 400mW Single 1.25V@150mA 8ns 300mA SOD-123 Switching Diode ROHS", LCSC Part Number=C917030, Manufacturer=JSMSEMI, Package=SOD-123, ComponentLink1Description=LCSC, ComponentLink1URL=https://www.lcsc.com/product-detail/Switching-Diode_JSMSEMI-1N4148W_C917030.html, Item Type=Diode, Manufacturer Part Number=1N4148W
D4: "±5% Single 3.1V~3.5V 300mW 3.3V SOD-323 Zener Diodes ROHS", LCSC Part Number=C123917, Manufacturer=JSMSEMI, Package=SOD-323, ComponentLink1Description=LCSC, ComponentLink1URL=https://www.lcsc.com/product-detail/Zener-Diodes_Shandong-Jingdao-Microelectronics-MM3Z3V3_C123917.html, Item Type=Diode, Manufacturer Part Number=MM3Z3V3
D5: "10.1A 200W 19.9V 13.3V 12V SOD-123F Electrostatic and Surge Protection (TVS/ESD) ROHS", LCSC Part Number=C178259, Manufacturer="Shandong Jingdao Microelectronics", Package=SOD-123F, ComponentLink7Description=LCSC, ComponentLink7URL=https://www.lcsc.com/product-detail/TVS_AnBon-SMBJ5-0A_C440263.html, Item Type=Diode, Manufacturer Part Number=SMF12A
F1: "10V 2A 100A 4A 2018 Resettable Fuses ROHS", LCSC Part Number=C70152, Manufacturer="Tech Fuse", Package=2018, ComponentLink1Description=LCSC, ComponentLink1URL=https://www.lcsc.com/product-detail/Resettable-Fuses_TECHFUSE-SMD2018-200_C70152.html, Item Type=Fuse, Manufacturer Part Number=SMD2018-200
J1: "Gold 250V 3A Brick nogging Square Pins 2.5mm 2P 260℃ 6mm -40℃~+105℃ 2.54mm 双排 Black Brass 2x1P SMD,P=2.54mm Pin Headers ROHS", LCSC Part Number=C2884014, Manufacturer="XKB Connectivity", Package=SMD,P=2.54mm, ComponentLink1Description=LCSC, ComponentLink1URL=https://www.lcsc.com/product-detail/Pin-Headers_XKB-Connectivity-X6521WVS-2x01H-C60D74_C2884014.html, Item Type=Connector, Manufacturer Part Number=X6521WVS-2x01H-C60D74
J4 J6: "Wire Connecting Pad", Item Type="SMD Pad", Manufacturer Part Number="1P SMD PAD"
J5: "CONN HEADER VERT 2POS 2.54MM", Color=Green, Current Rating=3A, Flammability Rating="UL94 V-0", High Temperature Housing=No, LCSC Part Number=C86471, Manufacturer="TE Connectivity", Manufacturer Part Number=8266292, Max Operating Temperature=105°C, Min Operating Temperature=-65°C, Package Quantity=3000, Supplier Part Number 1=1361864, Board Standoff="No (Without)", Category="Board to Board Connectors", ComponentLink1Description=https://datasheet.ciiva.com/11746/0900766b80d7c358-11746248.pdf?src-supplier=RSComponents, ComponentLink1URL=https://datasheet.ciiva.com/11746/0900766b80d7c358-11746248.pdf?src-supplier=RSComponents, ComponentLink2Description=https://datasheet.ciiva.com/30224/8266292-30224019.pdf?src-supplier=Onlinecomponents.com, ComponentLink2URL=https://datasheet.ciiva.com/30224/8266292-30224019.pdf?src-supplier=Onlinecomponents.com, ComponentLink3Description=https://datasheet.ciiva.com/29369/001094754-da-01-en-stiftleiste-1-reihig-0-0826629-2-29369600.pdf?src-supplier=Conrad, ComponentLink3URL=https://datasheet.ciiva.com/29369/001094754-da-01-en-stiftleiste-1-reihig-0-0826629-2-29369600.pdf?src-supplier=Conrad, ComponentLink4Description=https://datasheet.ciiva.com/6857/eng-cd-826629-aa-basefilename-6857135.pdf?src-supplier=Digi-Key, ComponentLink4URL=https://datasheet.ciiva.com/6857/eng-cd-826629-aa-basefilename-6857135.pdf?src-supplier=Digi-Key, ComponentLink5Description=https://datasheet.ciiva.com/14120/eh826629-draw-14120837.pdf?src-supplier=Distrelec, ComponentLink5URL=https://datasheet.ciiva.com/14120/eh826629-draw-14120837.pdf?src-supplier=Distrelec, Connector Type=Plug,Header,Pin, Contact Gender=Male, Contact Material=Bronze, Contact Mating Length=6.7mm, Contact Plating=Gold,Tin, Contact Post Length=0.1259inch, Contact Protection="No (Without)", Contact Shape=Square, Contact Type="Male Pin", Depth=2.5mm, ELV=Compliant, Gasket="No (Without)", Gender=Male, High Speed Serial Data Connector=No, Housing Color=Green, Housing Material=PBT, Item Type="Male Header", Keyed=No, Lead Free="Lead Free", Length=5.08mm, Mating Alignment="No (Without)", Mating Connector Lock="No (Without)", Mount="Straddle Mount", Number of Contacts=2, Number of Positions=2, Number of Rows=1, Orientation=Straight, Packaging=Carton, PCB Mount Retention=Without, PCB Mounting Orientation=Vertical, Pitch=2.54mm, Plating Thickness=0.8um, Radiation Hardening=No, REACH SVHC="No SVHC", RoHS=Yes, Row Spacing=2.54mm, Selectively Loaded="No (Without)", Series="AMPMODU MOD II", Stabilizers="No (Without)", Strain Relief="No (Without)", Supplier 1=RSComponents, Termination="Through Hole"
L1: library part SMMS1050-470M, "3A 47uH Molding Choke ±20% 4.5A SMD Power Inductors ROHS", LCSC Part Number=C149548, Manufacturer=SXN, ComponentLink1Description=LCSC, ComponentLink1URL=https://www.lcsc.com/product-detail/Power-Inductors_SXN-Shun-Xiang-Nuo-Elec-SMMS1050-470M_C149548.html, Manufacturer Part Number=SMMS1050-470M
L2: library part SDR1307A-101K, "Ind Power Unshielded Wirewound 100uH 10% 100KHz 25Q-Factor Ferrite 1.9A T/R", LCSC Part Number=C2042930, Manufacturer=Bourns, Supplier Part Number=SDR1307A-101KCT-ND, Category="Fixed Inductors", ComponentLink1Description=https://datasheet.ciiva.com/46435/1778094-46435133.pdf?src-supplier=Element14, ComponentLink1URL=https://datasheet.ciiva.com/46435/1778094-46435133.pdf?src-supplier=Element14, ComponentLink2Description=LCSC, ComponentLink2URL=https://www.lcsc.com/product-detail/Power-Inductors_BOURNS-SDR1307A-101K_C2042930.html, Item Type=Inductor, Manufacturer Part Number=SDR1307A-101K, Pricing="1=1.16, 10=0.982, 25=0.8928, 50=0.8392, 100=0.6964 (USD)", RoHS=Yes, Stock=2952, Supplier=Digi-Key
L3: library part LQP03HQ1N6B02D, "FIXED IND 1.6NH 1A 50 MOHM SMD", Case Code (Imperial)=0201, Case Code (Metric)=0603, Current Rating=1A, DC Resistance (DCR)=50mR, LCSC Part Number=C237384, Manufacturer=Murata, Max Operating Temperature=125°C, Min Operating Temperature=-55°C, Self Resonant Frequency=10GHz, Supplier Part Number=490-13883-1-ND, Test Frequency=500MHz, Case/Package=0201, Category="Fixed Inductors", ComponentLink1Description=http://search.murata.co.jp/Ceramy/image/img/P02/JELF243C-0021.pdf?src-supplier=Digi-Key, ComponentLink1URL=http://search.murata.co.jp/Ceramy/image/img/P02/JELF243C-0021.pdf?src-supplier=Digi-Key, Core Material=Non-Magnetic, Item Type=Inductor, Manufacturer Part Number=LQP03HQ1N6B02D, Mounting Technology="Surface Mount", Packaging="Cut Tape", Pricing="1=0.16, 10=0.145, 25=0.1236, 50=0.109, 100=0.1, 250=0.09088, 500=0.08544, 1000=0.06545, 2500=0.06181 (USD)", RoHS=Yes, RoHS Compliant=Yes, Series=LQP03, Shielding=Unshielded, Stock=27606, Supplier=Digi-Key
L4: library part LQP03TN24NH02D, "140mA 24nH ±3% 2.3Ω 0201 Inductors (SMD) ROHS", Case Code (Imperial)=0201, Case Code (Metric)=0603, Current Rating=140mA, DC Resistance (DCR)=2.3R, LCSC Part Number=C206441, Manufacturer=Murata, Max Operating Temperature=125°C, Min Operating Temperature=-55°C, Package Quantity=15000, Self Resonant Frequency=2GHz, Supplier Part Number=490-13004-1-ND, Test Frequency=500MHz, Tolerance=3%, Case/Package=0201, Category="Fixed Inductors", ComponentLink1Description=https://datasheet.ciiva.com/29692/s0084e-29692461.pdf?src-supplier=Digi-Key, ComponentLink1URL=https://datasheet.ciiva.com/29692/s0084e-29692461.pdf?src-supplier=Digi-Key, Core Material=Non-Magnetic, DC Current=140mA, Depth=0.33mm, Height - Seated (Max)=0.013inch, Item Type=Inductor, Length=0.024inch, Manufacturer Part Number=LQP03TN24NH02D, Military Standard=Not, Mounting Technology="Surface Mount", Packaging="Tape and Reel", Pricing="1=0.1, 10=0.041, 25=0.0364, 50=0.031, 100=0.0273, 250=0.025, 500=0.02272, 1000=0.01909, 2500=0.01636 (USD)", RoHS=Yes, RoHS Compliant=Yes, Series=LQP03TN_02, Shielding=Unshielded, Stock=40849, Supplier=Digi-Key, Technology="THIN FILM", Width=0.012inch
L5: library part MLG0603P2N0CT000, "FIXED IND 2NH 600MA 100 MOHM SMD", Case Code (Imperial)=0201, Case Code (Metric)=0603, Current Rating=600mA, DC Resistance (DCR)=100mR, LCSC Part Number=C531323, Manufacturer=TDK, Max Operating Temperature=125°C, Min Operating Temperature=-55°C, Package Quantity=15000, Self Resonant Frequency=8.5GHz, Supplier Part Number=445-172431-1-ND, Test Frequency=500MHz, Case/Package=0201, Category="Fixed Inductors", ComponentLink1Description=https://datasheet.ciiva.com/41860/inductor-commercial-high-frequency-mlg-qp-en-41860968.pdf?src-supplier=Digi-Key, ComponentLink1URL=https://datasheet.ciiva.com/41860/inductor-commercial-high-frequency-mlg-qp-en-41860968.pdf?src-supplier=Digi-Key, Core Material=Non-Magnetic, Height - Seated (Max)=0.013inch, Item Type=Inductor, Length=0.024inch, Manufacturer Part Number=MLG0603P2N0CT000, Mounting Technology="Surface Mount", Packaging="Cut Tape", Pricing="1=0.13, 10=0.118, 25=0.1, 50=0.0882, 100=0.0808, 250=0.07352, 500=0.06908, 1000=0.05292, 2500=0.04998 (USD)", RoHS=Yes, RoHS Compliant=Yes, Series=MLG-P, Shielding=Unshielded, Stock=23499, Supplier=Digi-Key, Width=0.012inch
Q1: "200V 5A 78W 580mΩ@10V,2.5A 3V@250uA N Channel TO-252-2(DPAK) MOSFETs ROHS", LCSC Part Number=C224101, Manufacturer=GOFRD, Package=TO-252-2(DPAK), ComponentLink1Description=LCSC, ComponentLink1URL=https://www.lcsc.com/product-detail/MOSFETs_GOFORD-5N20A-252_C224101.html, Item Type=Mosfet, Manufacturer Part Number=5N20A-252
R2 R4: library part WF04H1004DTL, "125mW ±100ppm/℃ ±0.5% 1MΩ 0402 Chip Resistor - Surface Mount ROHS", LCSC Part Number=C305257, Package=0402, ComponentLink1Description=LCSC, ComponentLink1URL=https://www.lcsc.com/product-detail/Chip-Resistor-Surface-Mount_Walsin-Tech-Corp-WF04H1004DTL_C305257.html, Manuacturer="Walsin Tech Crop", Manufacturer Part Number=WF04H1004DTL
R3: library part RC0201FR-07287KL, "SMD Chip Resistor, 287 kOhm, ± 1%, 50 mW, 0201 [0603 Metric], Thick Film, General Purpose", Case Code (Imperial)=0201, Case Code (Metric)=0603, LCSC Part Number=C474636, Manufacturer=YAGEO, Max Operating Temperature=125°C, Max Power Dissipation=50mW, Min Operating Temperature=-55°C, Temperature Coefficient=200ppm/°C, Tolerance=1%, Voltage Rating=25V, Case/Package=0201, Category="Chip SMD Resistors", ComponentLink1Description=LCSC, ComponentLink1URL=https://www.lcsc.com/product-detail/Chip-Resistor-Surface-Mount_YAGEO-RC0201FR-07287KL_C474636.html, ComponentLink2Description=http://www.yageo.com/documents/recent/PYu-RC_Group_51_RoHS_L_9.pdf?src-supplier=Digi-Key, ComponentLink2URL=http://www.yageo.com/documents/recent/PYu-RC_Group_51_RoHS_L_9.pdf?src-supplier=Digi-Key, ComponentLink3Description=https://www.yageo.com/upload/media/product/productsearch/datasheet/rchip/PYu-RC_Group_51_RoHS_L_11.pdf?src-supplier=Digi-Key, ComponentLink3URL=https://www.yageo.com/upload/media/product/productsearch/datasheet/rchip/PYu-RC_Group_51_RoHS_L_11.pdf?src-supplier=Digi-Key, Features="Moisture Resistant", Height=0.01inch, Item Type=Resistor, Length=0.024inch, Manufacturer Part Number=RC0201FR-07287KL, Number of Terminations=2, Package=0201, Packaging="Cut Tape", Pricing="1=0.057, 10=0.0097, 25=0.0092, 100=0.0057, 250=0.0056, 500=0.0054, 1000=0.0034, 3000=0.0032, 6000=0.0023 (USD)", RoHS=Yes, RoHS Compliant=Yes, Series=RC, Stock=19914, Supplier="Arrow Electronics", Supplier Part Number=RC0201FR-07287KL, Width=0.012inch
R5: library part RTT011622FTH, "50mW Thick Film Resistors 25V ±1% ±200ppm/℃ 16.2kΩ 0201 Chip Resistor - Surface Mount ROHS", LCSC Part Number=C166338, Manufacturer=RALEC, Package=0201, ComponentLink1Description=LCSC, ComponentLink1URL=https://www.lcsc.com/product-detail/Chip-Resistor-Surface-Mount_RALEC-RTT011622FTH_C166338.html, Item Type=Resistor, Manufacturer Part Number=RTT011622FTH
R6: library part RC0201FR-07154KL, "Res Thick Film 0201 154K Ohm 1% 1/20W ±200ppm/°C Molded SMD Paper T/R", Case Code (Imperial)=0201, Case Code (Metric)=0603, LCSC Part Number=C474540, Manufacturer=YAGEO, Max Operating Temperature=125°C, Max Power Dissipation=50mW, Min Operating Temperature=-55°C, Supplier Part Number=3110231, Temperature Coefficient=200ppm/°C, Tolerance=1%, Case/Package=0201, Category="Chip SMD Resistors", ComponentLink1Description=LCSC, ComponentLink1URL=https://www.lcsc.com/product-detail/Chip-Resistor-Surface-Mount_YAGEO-RC0201FR-07154KL_C474540.html, ComponentLink2Description=http://www.yageo.com/documents/recent/PYu-RC_Group_51_RoHS_L_9.pdf?src-supplier=Digi-Key, ComponentLink2URL=http://www.yageo.com/documents/recent/PYu-RC_Group_51_RoHS_L_9.pdf?src-supplier=Digi-Key, ComponentLink3Description=https://www.yageo.com/upload/media/product/productsearch/datasheet/rchip/PYu-RC_Group_51_RoHS_L_11.pdf?src-supplier=Digi-Key, ComponentLink3URL=https://www.yageo.com/upload/media/product/productsearch/datasheet/rchip/PYu-RC_Group_51_RoHS_L_11.pdf?src-supplier=Digi-Key, ComponentLink4Description=http://www.yageo.com.tw/exep/pages/download/literatures/PYu-R_INT-thick_7.pdf?src-supplier=Digi-Key, ComponentLink4URL=http://www.yageo.com.tw/exep/pages/download/literatures/PYu-R_INT-thick_7.pdf?src-supplier=Digi-Key, Features="Moisture Resistant", Height=0.01inch, Item Type=Resistor, Length=0.024inch, Manufacturer Part Number=RC0201FR-07154KL, Number of Terminations=2, Package=0201, Packaging="Cut Tape", Pricing="10000=0.0014, 50000=0.0013, 250000=0.0013, 750000=0.0012, 2000000=0.0011 (USD)", RoHS=Yes, RoHS Compliant=Yes, Series=RC, Stock=110000, Supplier="Future Electronics", Width=0.012inch
R8: library part RC0201FR-07499RL, "RES 499 OHM 1% 1/20W 0201", Case Code (Imperial)=0201, Case Code (Metric)=0603, LCSC Part Number=C138137, Manufacturer=Yageo, Max Operating Temperature=125°C, Max Power Dissipation=50mW, Min Operating Temperature=-55°C, Resistor Type="Thick Film", Temperature Coefficient=200ppm/°C, Tolerance=1%, Case/Package=0201, Category="Chip SMD Resistors", ComponentLink1Description=http://www.yageo.com/documents/recent/PYu-RC_Group_51_RoHS_L_10.pdf?src-supplier=Digi-Key, ComponentLink1URL=http://www.yageo.com/documents/recent/PYu-RC_Group_51_RoHS_L_10.pdf?src-supplier=Digi-Key, ComponentLink2Description=http://www.yageo.com/documents/recent/PYu-RC_Group_51_RoHS_L_9.pdf?src-supplier=Digi-Key, ComponentLink2URL=http://www.yageo.com/documents/recent/PYu-RC_Group_51_RoHS_L_9.pdf?src-supplier=Digi-Key, Depth=0.3mm, Features="Moisture Resistant", Height=0.01inch, Item Type=Resistor, Lead Free="Lead Free", Length=0.024inch, Manufacturer Part Number=RC0201FR-07499RL, Military Standard=Not, Number of Terminations=2, Packaging="Tape and Reel", Pricing 1="10000=0.00128 (USD)", Resistance=499R, RoHS=Yes, RoHS Compliant=Yes, Stock 1=150000, Supplier 1=Avnet, Supplier Part Number 1=RC0201FR-07499RL, Width=0.012inch
R11: library part RC0201FR-0710KL, "RES SMD 10K OHM 1% 1/20W 0201", LCSC Part Number=C106225, Manufacturer=Yageo, Package=0201, ComponentLink7Description=LCSC, ComponentLink7URL=https://www.lcsc.com/product-detail/Chip-Resistor-Surface-Mount_YAGEO-RC0201FR-0710KL_C106225.html, Item Type=Resistor, Manufacturer Part Number=RC0201FR-0710KL
R12 R18 R19 R25 R30: library part TC33X-2-103E, "TRIMMER 10K OHM 0.1W J LEAD TOP", Color=Silver, LCSC Part Number=C719176, Manufacturer=Bourns, Max Operating Temperature=100°C, Max Power Dissipation=100mW, Min Operating Temperature=-40°C, Package Quantity=1, Resistance=10kR, Resistance Tolerance=25%, Resistor Type=Cermet, Supplier Part Number 1=4617135P, Temperature Coefficient=250ppm/°C, Voltage Rating (DC)=50V, Category="Variable Resistors and Potentiometers", ComponentLink1Description=https://datasheet.ciiva.com/11830/0900766b802749b3-11830705.pdf?src-supplier=Rs, ComponentLink1URL=https://datasheet.ciiva.com/11830/0900766b802749b3-11830705.pdf?src-supplier=Rs, ComponentLink2Description=https://datasheet.ciiva.com/7953/1818686-7953349.pdf?src-supplier=Element14, ComponentLink2URL=https://datasheet.ciiva.com/7953/1818686-7953349.pdf?src-supplier=Element14, ComponentLink3Description=https://datasheet.ciiva.com/26944/getdatasheetpartid-183773-26944166.pdf?src-supplier=Verical, ComponentLink3URL=https://datasheet.ciiva.com/26944/getdatasheetpartid-183773-26944166.pdf?src-supplier=Verical, ComponentLink4Description=https://datasheet.ciiva.com/2155/tc33-2155962.pdf?src-supplier=Digi-Key, ComponentLink4URL=https://datasheet.ciiva.com/2155/tc33-2155962.pdf?src-supplier=Digi-Key, ComponentLink5Description=https://datasheet.ciiva.com/2155/tc33-2155963.pdf?src-supplier=Digi-Key, ComponentLink5URL=https://datasheet.ciiva.com/2155/tc33-2155963.pdf?src-supplier=Digi-Key, ComponentLink6Description=https://datasheet.ciiva.com/2155/tc33-2155964.pdf?src-supplier=Digi-Key, ComponentLink6URL=https://datasheet.ciiva.com/2155/tc33-2155964.pdf?src-supplier=Digi-Key, ComponentLink7Description=https://datasheet.ciiva.com/8089/tc33-8089484.pdf?src-supplier=Avnet, ComponentLink7URL=https://datasheet.ciiva.com/8089/tc33-8089484.pdf?src-supplier=Avnet, ComponentLink8Description=https://datasheet.ciiva.com/28659/1520225-28659212.pdf?src-supplier=Element14, ComponentLink8URL=https://datasheet.ciiva.com/28659/1520225-28659212.pdf?src-supplier=Element14, Contact Plating=Copper,Tin,Silver, Depth=3.8mm, Height=0.047inch, Item Type=Potentiometer, Lead Free="Lead Free", Length=3mm, Manufacturer Part Number=TC33X-2-103E, Military Standard=Not, Mount="Surface Mount", Number of Turns=1, Packaging="Tape and Reel", Power Rating=100mW, Pricing 1="500=0.24400, 1000=0.22000, 2000=0.19700, 4000=0.17300 (GBP)", Radiation Hardening=No, Reach SVHC Compliant=Yes, RoHS=Yes, RoHS Compliant=Yes, Series=TC33, Stock 1=950, Supplier 1=Rs, Taper=Linear, Termination="Foot Print", Tolerance=25%, Weight=29.4mg, Width=0.118inch
R13: library part CRCW06033K00FKEAHP, "RES SMD 3K OHM 1% 1/3W 0603", LCSC Part Number=C844164, Manufacturer="Vishay Intertech", Package=0603, ComponentLink1Description=LCSC, ComponentLink1URL=https://www.lcsc.com/product-detail/Chip-Resistor-Surface-Mount_Vishay-Intertech-CRCW06033K00FKEAHP_C844164.html, Manufacturer Part Number=CRCW06033K00FKEAHP
R14: library part RC2512JK-0751RL, "1W Thick Film Resistors 200V ±100ppm/℃ ±5% 51Ω 2512 Chip Resistor - Surface Mount ROHS", LCSC Part Number=C136999, Manufacturer=YAGEO, Package=2512, ComponentLink1Description=LCSC, ComponentLink1URL=https://www.lcsc.com/product-detail/Chip-Resistor-Surface-Mount_YAGEO-RC2512JK-0751RL_C136999.html, Item Type=Resistor, Manufacturer Part Number=RC2512JK-0751RL